# Altium PCB OFP_MCM_v1.62.PcbDoc (part 1 of 8)
Units mil, origin at the board's own origin, x right, y up, seen from the top; angles counter-clockwise.
Board outline 4330.71 x 4724.41 mil, 4 copper layers (Top Layer, Layer 1, Layer 2, Bottom Layer), stack 62.047 mil thick; 385 components, 287 nets, 1341 pads, 554 vias.
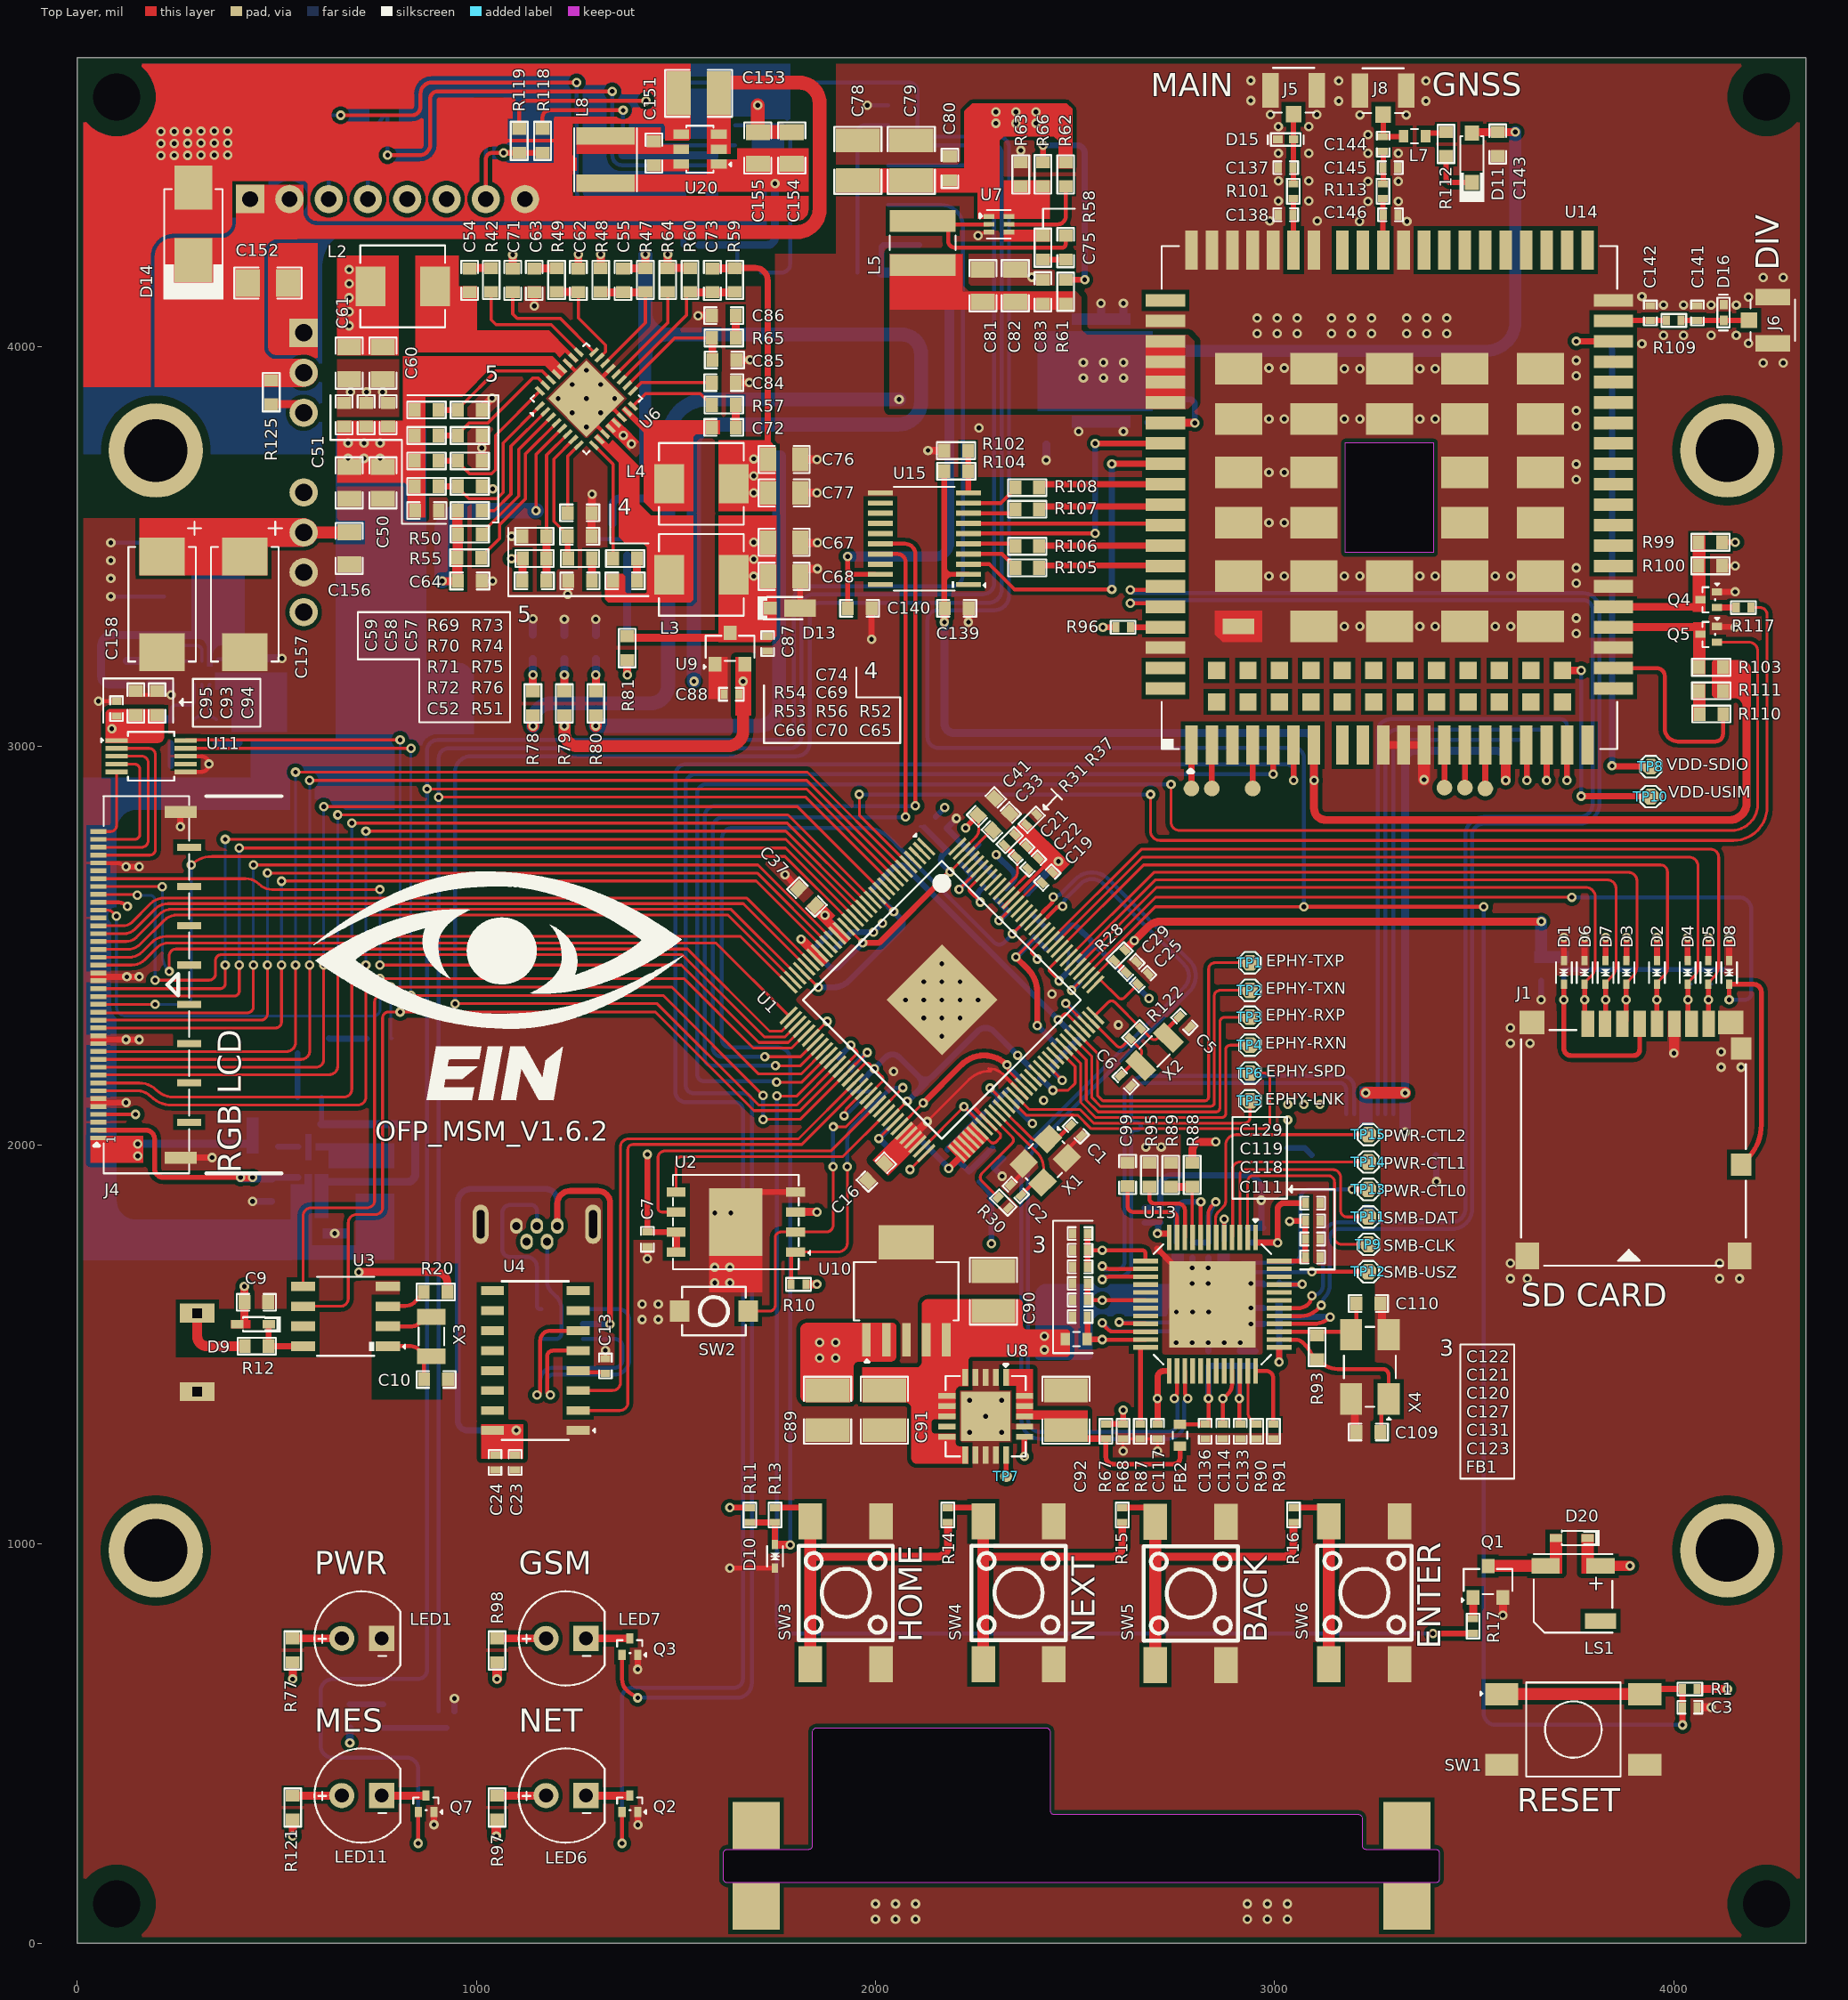
[diagram p0: Top Layer view]
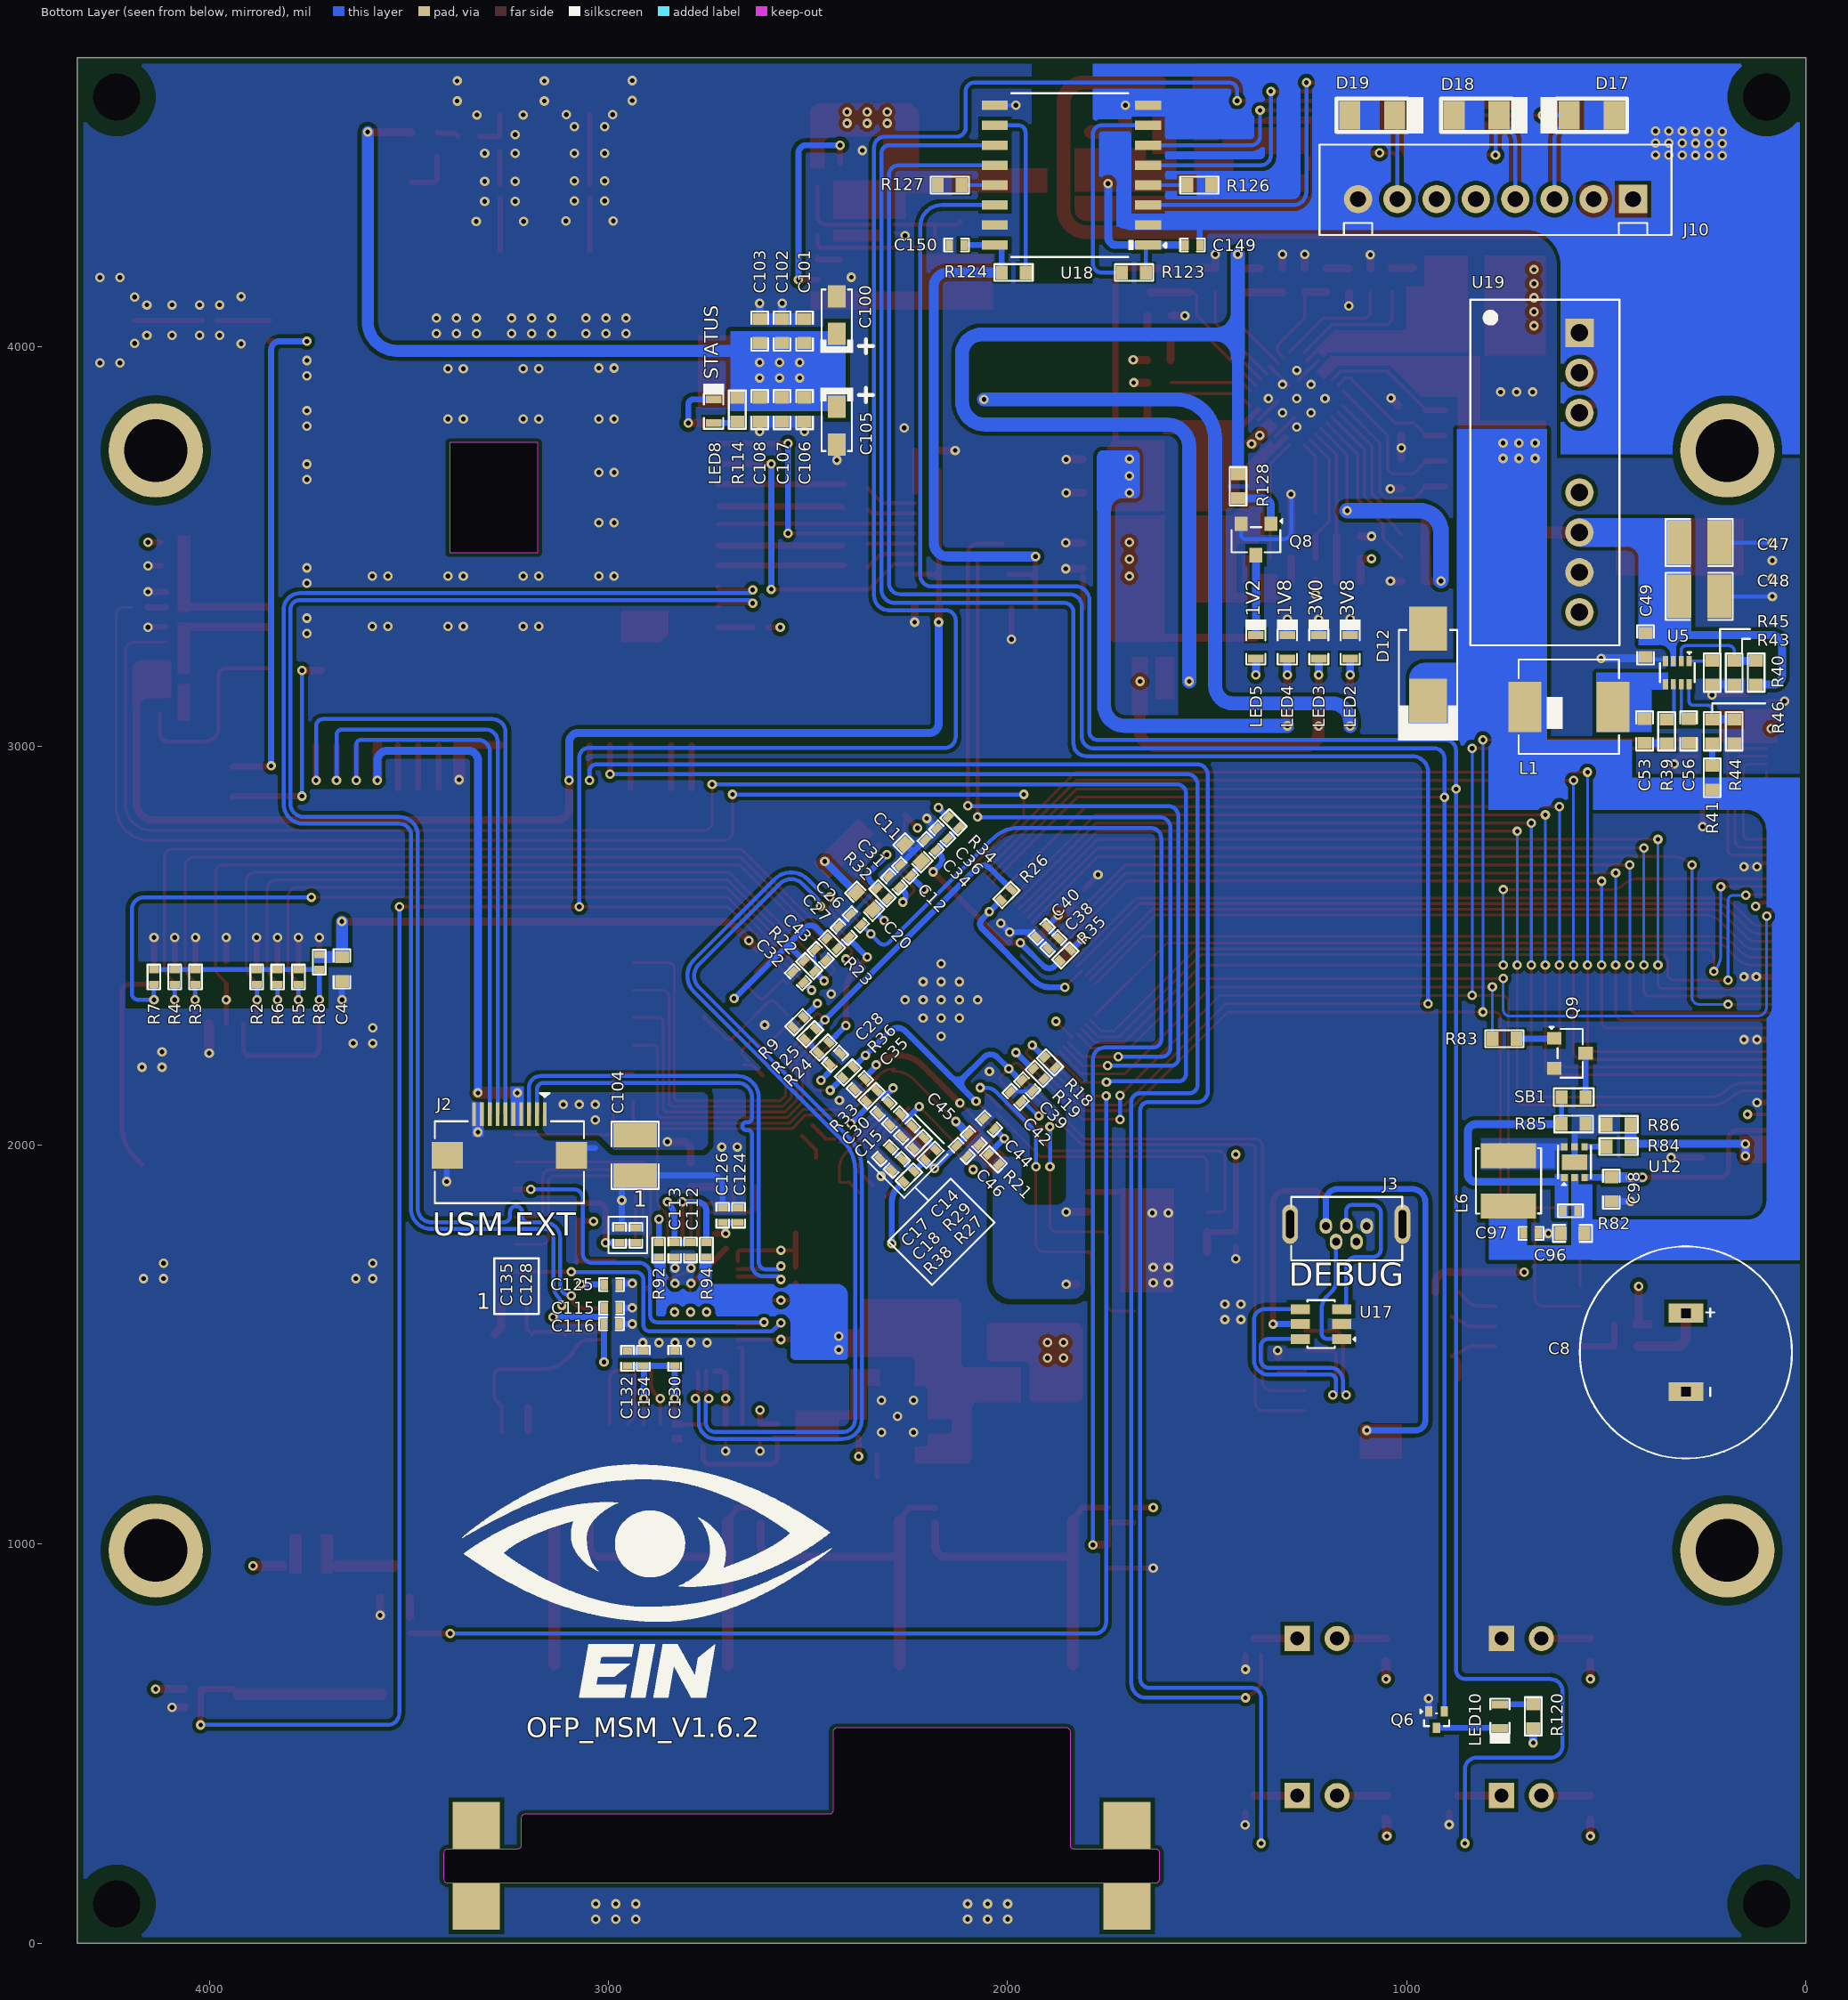
[diagram p1: Bottom Layer view, seen from below]
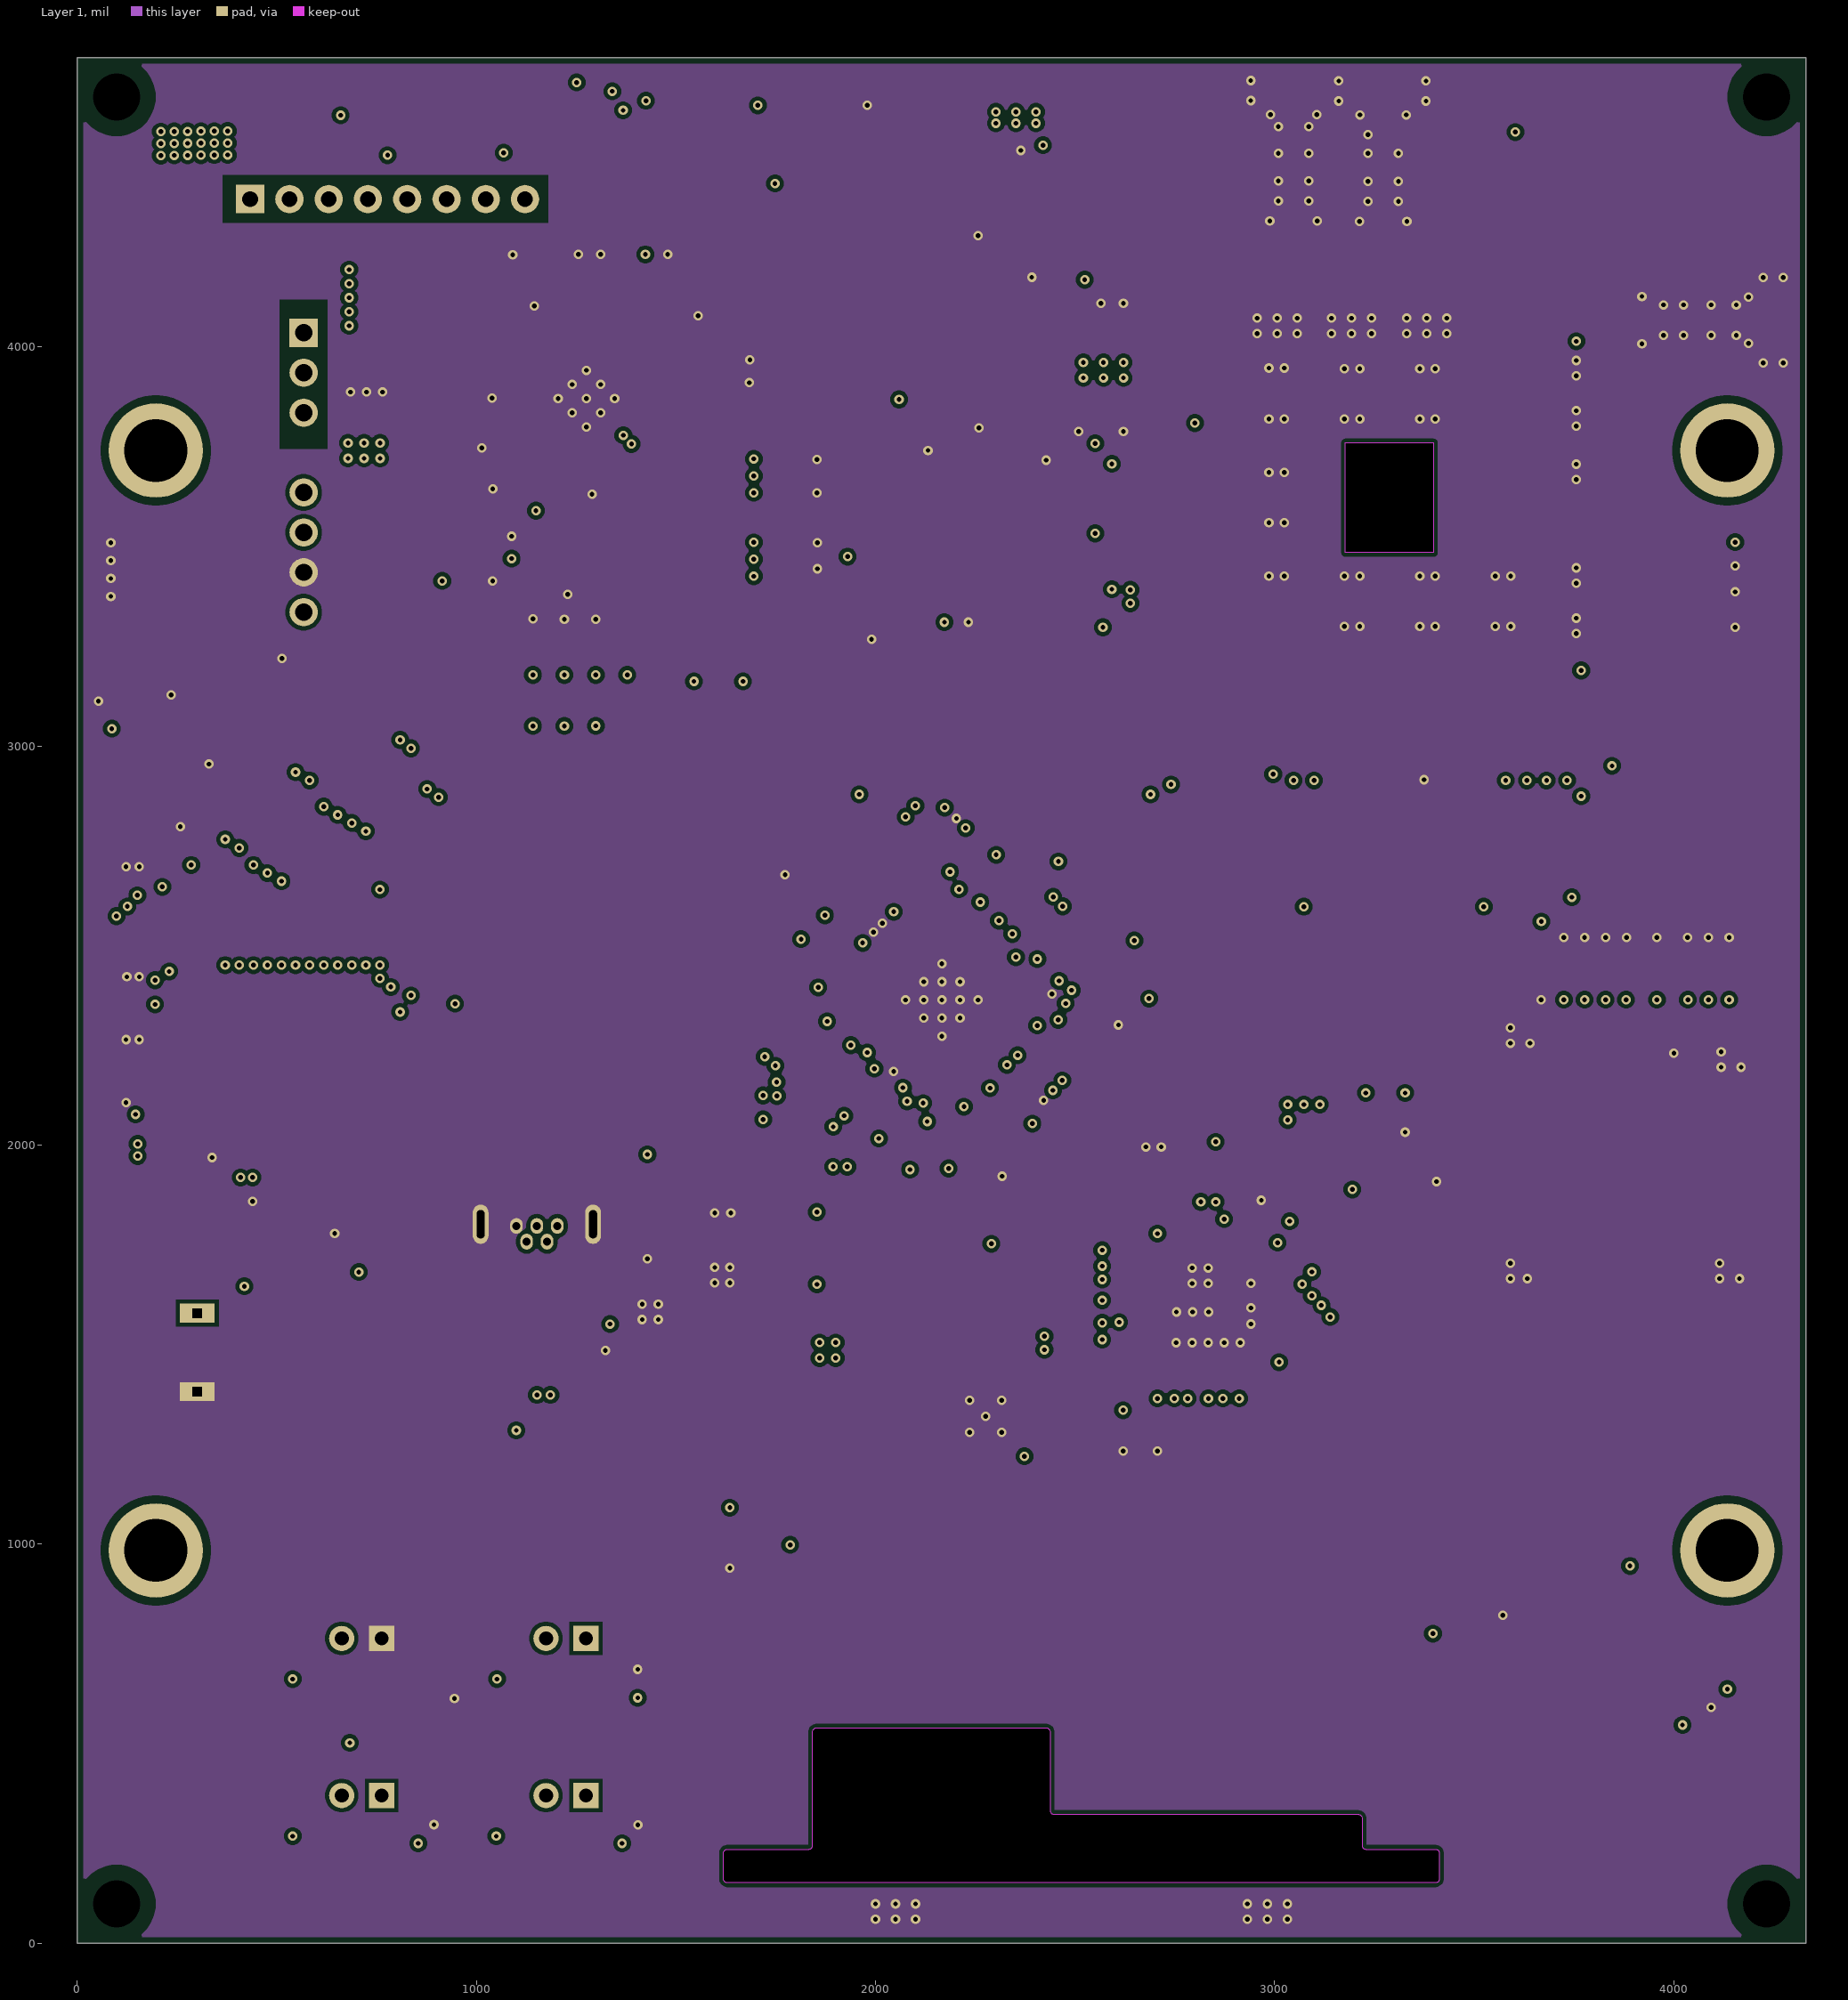
[diagram p2: Layer 1]
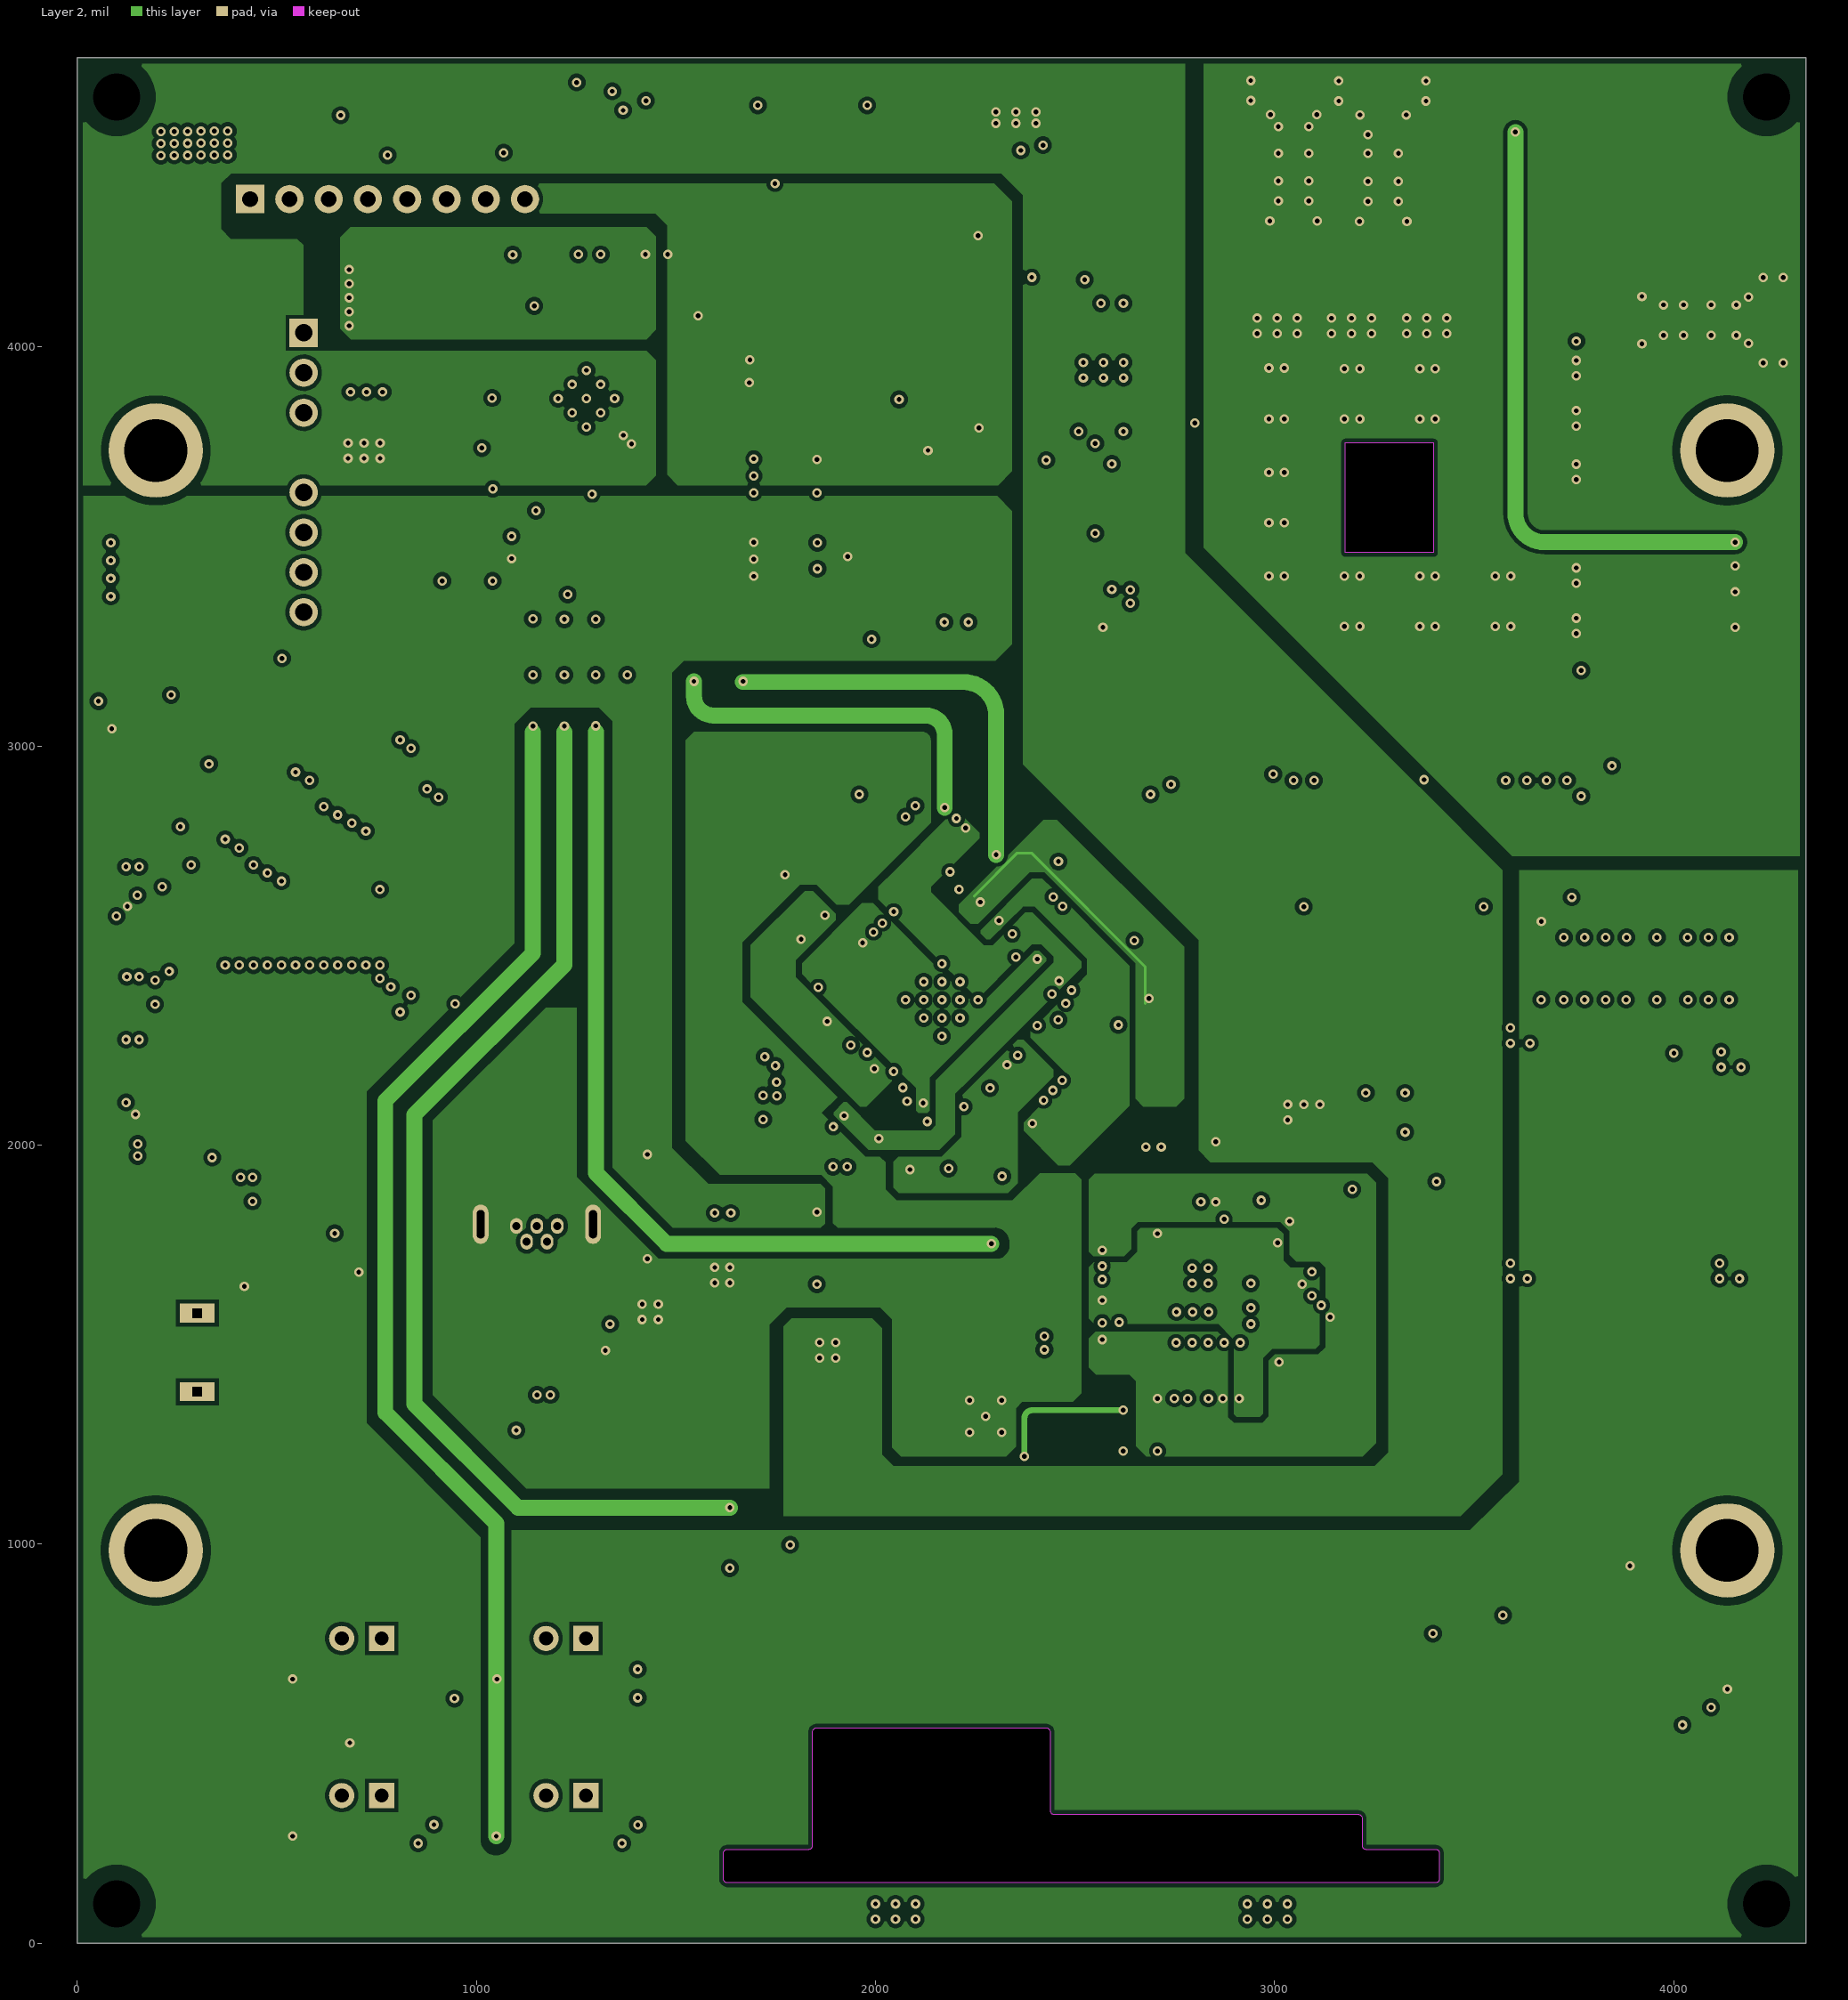
[diagram p3: Layer 2]
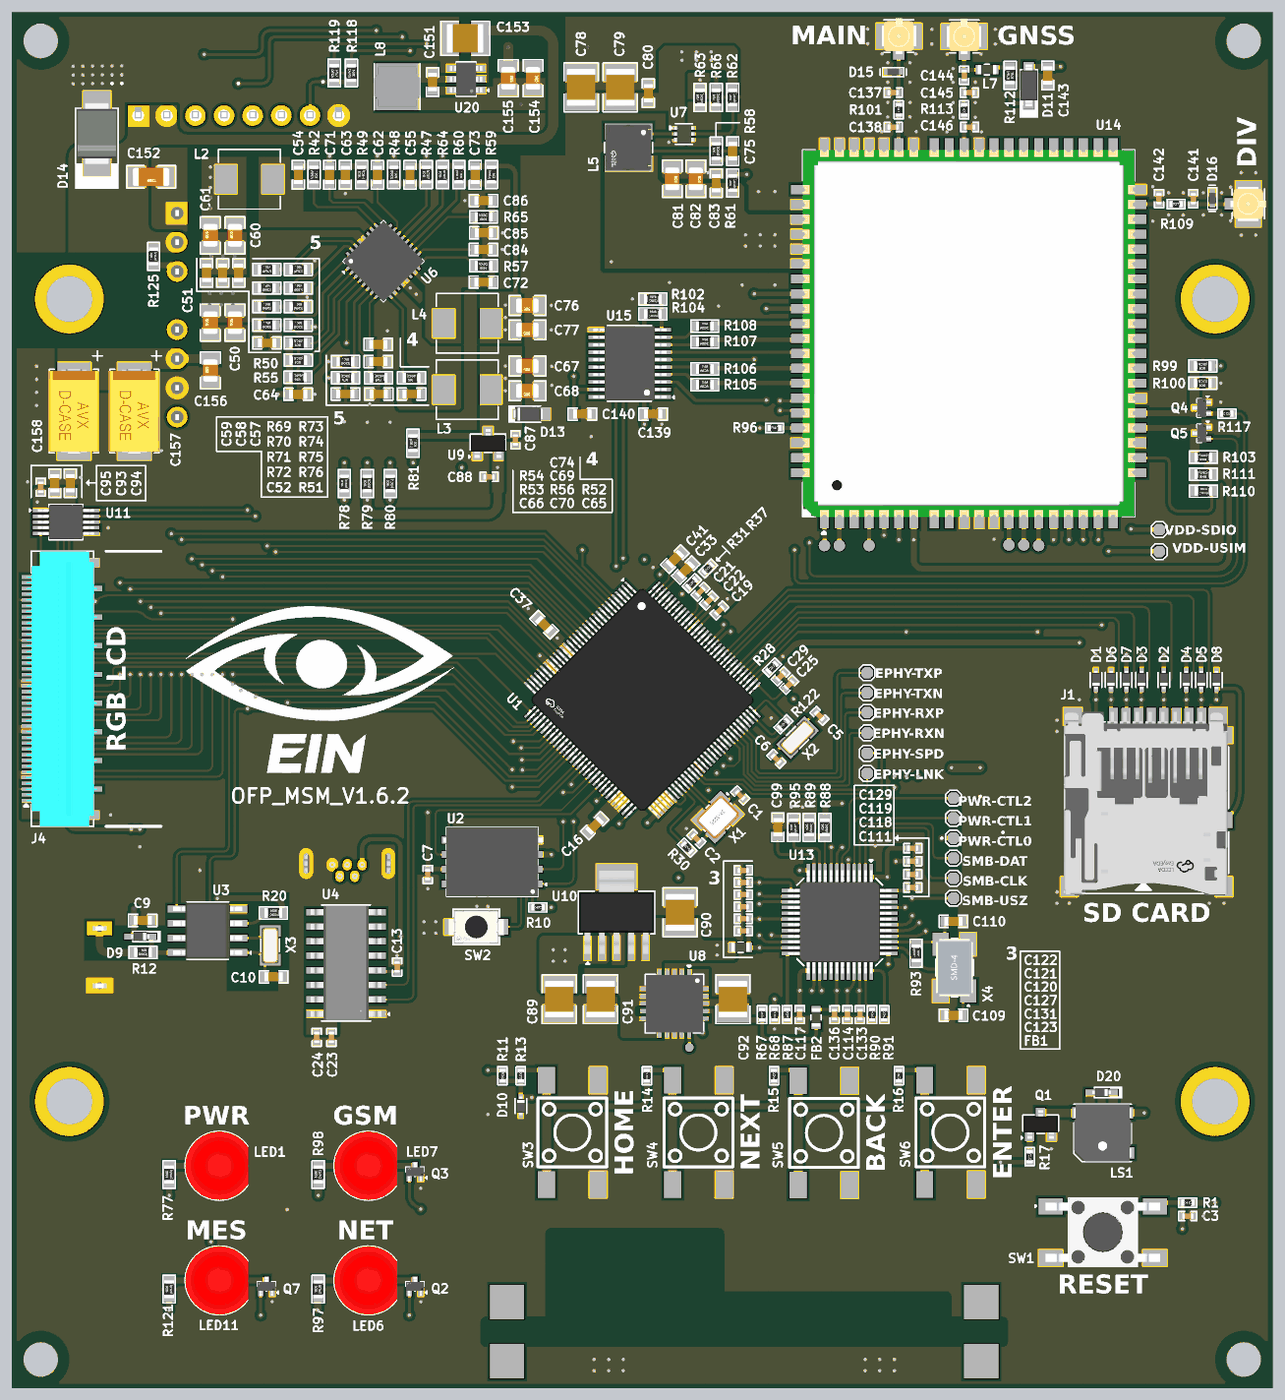
[diagram p8: 3D render of the assembled board from above, using the file's embedded part models]
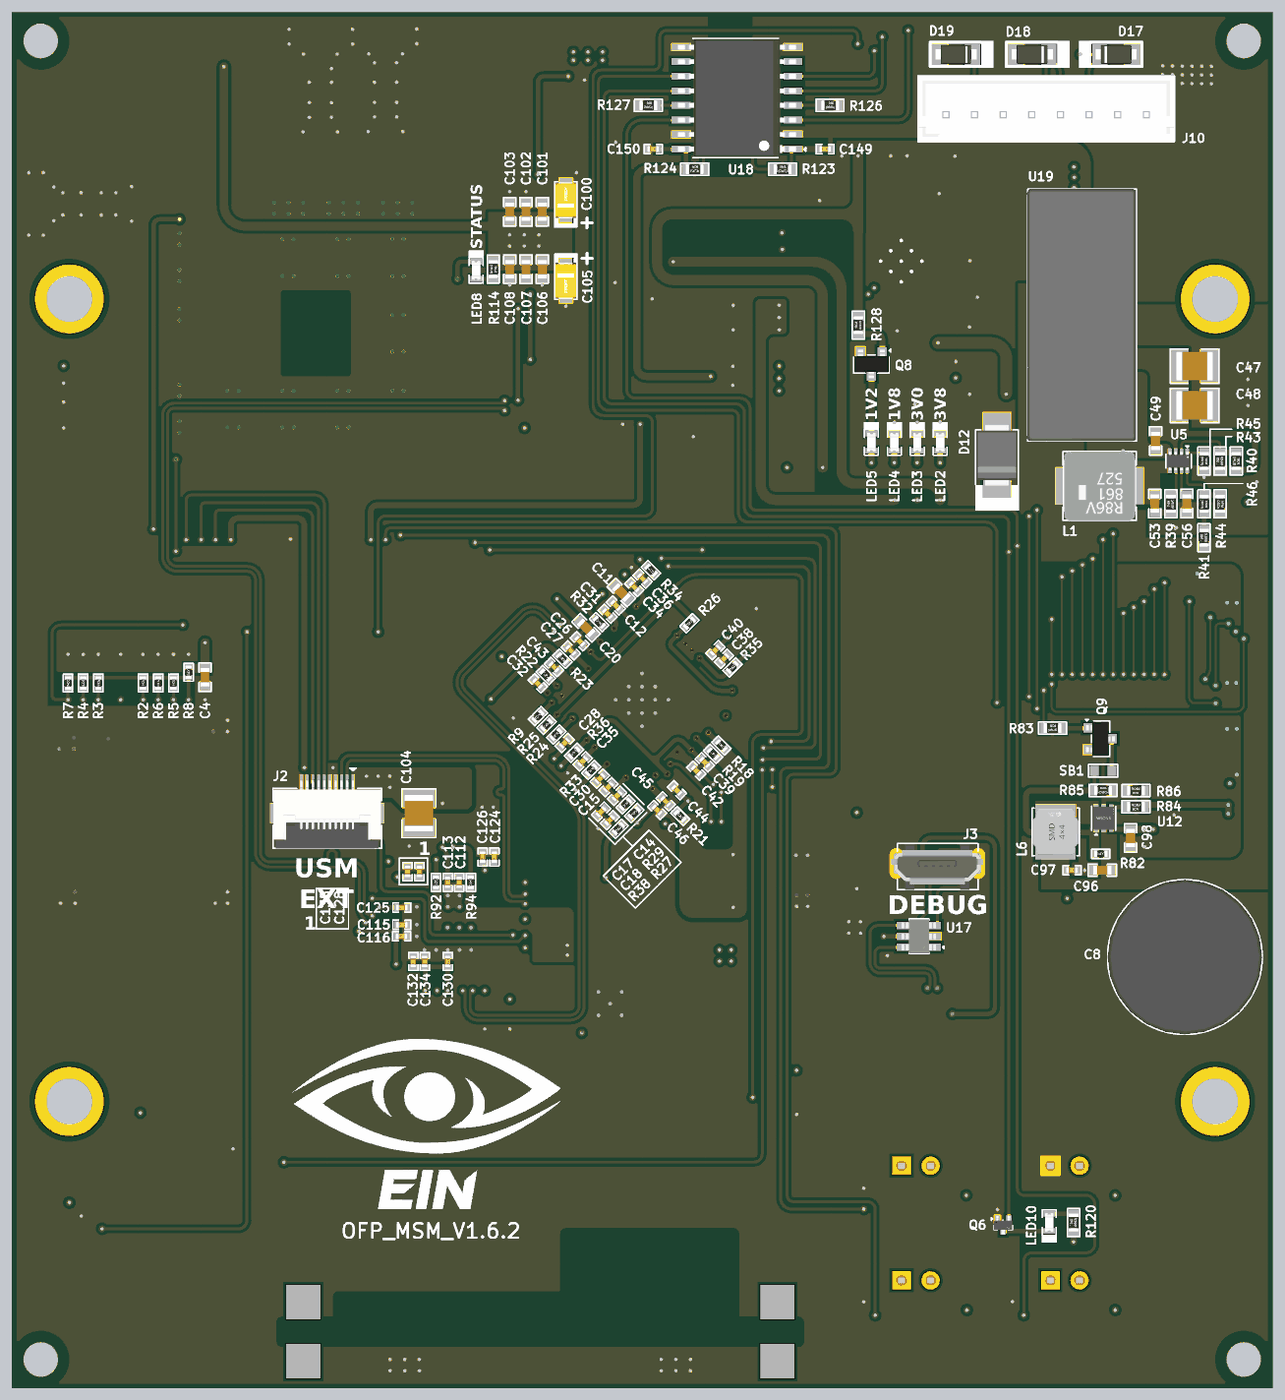
[diagram p9: 3D render of the assembled board from below, using the file's embedded part models]

## Layer stack, top to bottom
Top Solder: solder mask 0.4, Solder Resist, Dk 3.5
Top Layer: signal copper 1.378
Dielectric 2: prepreg 7.992, PP-006, Dk 4.4
Layer 1: signal copper 1.378
Dielectric 1: dielectric 40.551, FR-4, Dk 4.6
Layer 2: signal copper 1.378
Dielectric 3: prepreg 7.992, PP-006, Dk 4.4
Bottom Layer: signal copper 1.378
Bottom Solder: solder mask 0.4, Solder Resist, Dk 3.5

## Board outline
0,0 0,4724.41 4330.71,4724.41 4330.71,0
cut-out: 1629.13,151.22 cw(c1629.13,161.42) 1618.93,161.42 1618.93,225.59 cw(c1629.13,225.59) 1629.13,235.79 1833.05,235.79 ccw(c1833.05,244.9) 1842.16,244.9 1842.16,529.53 cw(c1852.36,529.53) 1852.36,539.73 2427.16,539.73 cw(c2427.16,529.53) 2437.36,529.53 2437.36,332.85 ccw(c2447.01,332.85) 2447.01,323.19 3208.66,323.19 cw(c3208.66,312.99) 3218.85,312.99 3218.85,244.82 ccw(c3227.88,244.82) 3227.88,235.79 3402.36,235.79 cw(c3402.36,225.59) 3412.56,225.59 3412.56,161.42 cw(c3402.36,161.42) 3402.36,151.22
cut-out: 3177.17,3484.25 3177.17,3759.84 3397.64,3759.84 3397.64,3484.25

## Design rules (kind name [scope] priority, off if disabled: settings)
BoardOutlineClearance [All] p1: gap=0 ignorepadtopadclearanceinfootprint=FALSE except(15: Poly-OutlineEdge)
Clearance [All] p1: gap=10 ignorepadtopadclearanceinfootprint=FALSE except(5: Track-Via; 6: Arc-Via SMDPad-SMDPad; 7: Arc-Arc Arc-Track Arc-SMDPad Arc-THPad Arc-Fill Arc-Region Track-Track Track-SMDPad Track-THPad Track-Fill Track-Region SMDPad-Via SMDPad-Fill SMDPad-Region THPad-THPad THPad-Region Via-Fill Via-Region Fill-Fill Fill-Region Region-Region; 15: Poly-Poly)
ComponentClearance [All] p1: gap=0 collisioncheckmode=3 verticalgap=0 showdistances=FALSE
DiffPairsRouting [InDifferentialPairClass('DIFF_USB')] p1: maxlimit=10 minlimit=7 mostfreqgap=10 toplayer_maxgap=7 toplayer_prefgap=7 toplayer_minwidth=10 toplayer_maxwidth=10 toplayer_prefwidth=10 midlayer1_mingap=10 midlayer1_minwidth=7 midlayer1_maxwidth=7 midlayer1_prefwidth=7 midlayer2_mingap=10 midlayer2_minwidth=7 midlayer2_maxwidth=7 midlayer2_prefwidth=7 bottomlayer_maxgap=7 bottomlayer_prefgap=7 bottomlayer_minwidth=10 bottomlayer_maxwidth=10 bottomlayer_prefwidth=10 impedanceprofiledriven=TRUE impedanceprofileid={ABD523BC-F643-4530-ABE1-0D8876D3E9E7} impedanceprofilevalue=90.000000 maxuncoupledlength=500
HoleSize [All] p1: absolutevalues=TRUE maxlimit=1000 minlimit=1 maxpercent=80.000 minpercent=20.000
HoleToHoleClearance [All] p1: gap=0 allowstackedmicrovias=TRUE
MinimumSolderMaskSliver [All] p1: minsoldermaskwidth=0
PolygonConnect [All] p1: connectstyle=Direct reliefconductorwidth=10 reliefentries=4 polygonreliefangle="90 Angle" airgapwidth=10
RoutingVias [All] p1: holewidth=11.81 width=23.62 viastyle="Through Hole" minholewidth=7.87 minwidth=15.75 maxholewidth=27.56 maxwidth=47.24
ShortCircuit "ShortCircuit - No NET" [InNet('No Net')] p1: allowed=TRUE
SilkToSilkClearance [All] p1: silktosilkclearance=0
SilkToSolderMaskClearance [IsPad] p1: minsilkscreentomaskgap=0 clearancetoexposedcopper=TRUE
SolderMaskExpansion [All] p1: expansion=4 istentingtop=FALSE
SupplyNets "Schematic Supply Nets_7" [InNet('GND-IN')] p1: voltage=0.000
SupplyNets "Schematic Supply Nets_4" [InNet('3V3-I')] p2: voltage=0.000
SupplyNets "Schematic Supply Nets_1" [InNet('12V')] p3: voltage=0.000
SupplyNets "Schematic Supply Nets_51" [InNet('VCC-DRAM')] p4: voltage=0.000
SupplyNets "Schematic Supply Nets_50" [InNet('+EXT')] p5: voltage=0.000
SupplyNets "Schematic Supply Nets_49" [InNet('VCC-RTC')] p6: voltage=0.000
SupplyNets "Schematic Supply Nets_48" [InNet('VDD11')] p7: voltage=0.000
SupplyNets "Schematic Supply Nets_47" [InNet('VCC-USB')] p8: voltage=0.000
SupplyNets "Schematic Supply Nets_40" [InNet('+1.8V')] p9: voltage=0.000
SupplyNets "Schematic Supply Nets_39" [InNet('VRA1')] p10: voltage=0.000
SupplyNets "Schematic Supply Nets_38" [InNet('VLED+')] p11: voltage=0.000
SupplyNets "Schematic Supply Nets_37" [InNet('+5VUSB')] p12: voltage=0.000
SupplyNets "Schematic Supply Nets_36" [InNet('VDD33')] p13: voltage=0.000
SupplyNets "Schematic Supply Nets_35" [InNet('VLED-')] p14: voltage=0.000
SupplyNets "Schematic Supply Nets_34" [InNet('VCC-MCSI')] p15: voltage=0.000
SupplyNets "Schematic Supply Nets_32" [InNet('V7V')] p16: voltage=0.000
SupplyNets "Schematic Supply Nets_31" [InNet('AVCC')] p17: voltage=0.000
SupplyNets "Schematic Supply Nets_30" [InNet('3.3V-HUB')] p18: voltage=0.000
SupplyNets "Schematic Supply Nets_28" [InNet('VDD-SYS')] p19: voltage=0.000
SupplyNets "Schematic Supply Nets_27" [InNet('AGND')] p20: voltage=0.000
SupplyNets "Schematic Supply Nets_26" [InNet('RTC_VIO')] p21: voltage=0.000
SupplyNets "Schematic Supply Nets_25" [InNet('VSD')] p22: voltage=0.000
SupplyNets "Schematic Supply Nets_22" [InNet('VCC_PE')] p23: voltage=0.000
SupplyNets "Schematic Supply Nets_21" [InNet('+3.0V')] p24: voltage=0.000
SupplyNets "Schematic Supply Nets_20" [InNet('VDD-PHY')] p25: voltage=0.000
SupplyNets "Schematic Supply Nets_18" [InNet('+3.8V')] p26: voltage=0.000
SupplyNets "Schematic Supply Nets_17" [InNet('+USIM')] p27: voltage=0.000
SupplyNets "Schematic Supply Nets_16" [InNet('SVREF')] p28: voltage=0.000
SupplyNets "Schematic Supply Nets_15" [InNet('CH_3.3V')] p29: voltage=0.000
SupplyNets "Schematic Supply Nets_14" [InNet('VCC-HP')] p30: voltage=0.000
SupplyNets "Schematic Supply Nets_13" [InNet('V3S_RST')] p31: voltage=0.000
SupplyNets "Schematic Supply Nets_12" [InNet('HPVCCBP')] p32: voltage=0.000
SupplyNets "Schematic Supply Nets_11" [InNet('+1.2V')] p33: voltage=0.000
SupplyNets "Schematic Supply Nets_10" [InNet('VCC-PLL')] p34: voltage=0.000
SupplyNets "Schematic Supply Nets_9" [InNet('+3.3V')] p35: voltage=0.000
SupplyNets "Schematic Supply Nets_8" [InNet('VRA2')] p36: voltage=0.000
SupplyNets "Schematic Supply Nets_6" [InNet('1.1V-HUB')] p37: voltage=0.000
SupplyNets "Schematic Supply Nets_5" [InNet('VDD-CPU')] p38: voltage=0.000
SupplyNets "Schematic Supply Nets_3" [InNet('VCC-PHY')] p39: voltage=0.000
SupplyNets "Schematic Supply Nets_2" [InNet('KEYADC0')] p40: voltage=0.000
SupplyNets "Schematic Supply Nets" [InNet('VCC-IO')] p41: voltage=0.000
SupplyNets "Schematic Supply Nets_45" [InNet('GND')] p42: voltage=0.000
SupplyNets "Schematic Supply Nets_42" [InNet('+5V')] p43: voltage=0.000
SupplyNets "Schematic Supply Nets_41" [InNet('VIN+')] p44: voltage=0.000
Width [All] p1: maxlimit=100 minlimit=7 preferedwidth=15 minimp=50.000000 maximp=50.000000 favimp=50.000000
22 further rules are at their usual default settings.

## Classes and differential pairs
differential pair class DIFF_USB: CH_USB D USB-D USB-GSM-D USB-PD-D
component class RGB-LCD-Sheet: C93 C94 C95 C96 C97 C98 J4 L6 Q9 R82 R83 R84 R85 R86 SB1 U11 U12
component class Others-Sheet: C149 C150 C151 C152 C153 C154 C155 C156 C157 C158 D14 D17 D18 D19 J10 L8 LED10 LED11 Q6 Q7 R117 R118 R119 R120 R121 R123 R124 R125 R126 R127 U18 U19 U20
component class Microprocessor-Sheet: C1 C2 C3 C4 C5 C6 C7 C8 C9 C10 C11 C12 C13 C14 C15 C16 C17 C18 C19 C20 C21 C22 C23 C24 C25 C26 C27 C28 C29 C30 C31 C32 C33 C34 C35 C36 C37 C38 C39 C40 C41 C42 C43 C44 C45 C46 D1 D2 D3 D4 D5 D6 D7 D8 D9 D10 D20 J1 J2 J3 LS1 Q1 R1 R2 R3 R4 R5 R6 R7 R8 R9 R10 R11 R12 R13 R14 R15 R16 R17 R18 R19 R20 R21 R22 R23 R24 R25 R26 R27 R28 R29 R30 R31 R32 R33 R34 R35 R36 R37 R38 R122 SW1 SW2 SW3 SW4 SW5 SW6 TP1 TP2 TP3 TP4 TP5 TP6 U1 U2 U3 U4 U17 X1 X2 X3
component class GSM-USB-HUB-Sheet: C99 C100 C101 C102 C103 C104 C105 C106 C107 C108 C109 C110 C111 C112 C113 C114 C115 C116 C117 C118 C119 C120 C121 C122 C123 C124 C125 C126 C127 C128 C129 C130 C131 C132 C133 C134 C135 C136 C137 C138 C139 C140 C141 C142 C143 C144 C145 C146 D11 D15 D16 FB1 FB2 J5 J6 J8 L7 LED6 LED7 LED8 Q2 Q3 Q4 Q5 R87 R88 R89 R90 R91 R92 R93 R94 R95 R96 R97 R98 R99 R100 R101 R102 R103 R104 R105 R106 R107 R108 R109 R110 R111 R112 R113 R114 TP8 TP9 TP10 TP11 TP12 TP13 TP14 TP15 U13 U14 U15 X4
component class Power-Sheet: C47 C48 C49 C50 C51 C52 C53 C54 C55 C56 C57 C58 C59 C60 C61 C62 C63 C64 C65 C66 C67 C68 C69 C70 C71 C72 C73 C74 C75 C76 C77 C78 C79 C80 C81 C82 C83 C84 C85 C86 C87 C88 C89 C90 C91 C92 D12 D13 L1 L2 L3 L4 L5 LED1 LED2 LED3 LED4 LED5 Q8 R39 R40 R41 R42 R43 R44 R45 R46 R47 R48 R49 R50 R51 R52 R53 R54 R55 R56 R57 R58 R59 R60 R61 R62 R63 R64 R65 R66 R67 R68 R69 R70 R71 R72 R73 R74 R75 R76 R77 R78 R79 R80 R81 R128 TP7 U5 U6 U7 U8 U9 U10
differential pair D: +D_P -D_N
differential pair CH_U: +CH_U_P -CH_U_N
differential pair USB-PD-D: +USB-PD-D_P -USB-PD-D_N
differential pair USB-GSM-D: +USB-GSM-D_P -USB-GSM-D_N
differential pair USB-D: +USB-D_P -USB-D_N

## Components (designator, comment, footprint, x,y, rotation, side; value= is the part's Value field where it differs from the comment)
C1 "15pF" Cap-0402 2501.97,2036.22 r135 top
C2 "15pF" Cap-0402 2351.12,1886.86 r315 top
C3 "1uF" Cap-0402 4040,591.15 r180 top
C4 "10uF" Cap-0603 3667.58,2441.21 r90 bottom
C5 "15pF" Cap-0402 2774.04,2308.58 r135 top
C6 "15pF" Cap-0402 2626.31,2160.98 r135 top
C7 "0.1uF" Cap-0402 1428.32,1763.59 r90 top value=100nF
C8 "0.47F" "SC EB 5R5 474 M" 300.78,1480.32 r270 bottom
C9 "0.1uF" Cap-0603 448.77,1606.08 r180 top value=100nF
C10 "12pF" Cap-0603 899.04,1412.46 r180 top
C11 "10uF" Cap-0603 2236.89,2731.98 r225 bottom
C12 "0.1uF" Cap-0402 2256.34,2687.54 r225 bottom value=100nF
C13 "0.1uF" Cap-0402 1323.14,1446.32 r270 top value=100nF
C14 "0.1uF" Cap-0402 2251.96,2034.43 r135 bottom value=100nF
C15 "0.1uF" Cap-0402 2281.52,2063.99 r135 bottom value=100nF
C16 "10uF" Cap-0603 2001.91,1932 r45 top
C17 "1uF" Cap-0402 2306.68,1979.57 r135 bottom
C18 "0.1uF" Cap-0402 2276.96,1950.28 r135 bottom value=100nF
C19 "0.1uF" Cap-0402 2430.25,2670.36 r225 top value=100nF
C20 "10uF" Cap-0603 2357.9,2610.96 r225 bottom
C21 "4.7uF" Cap-0402 2365.45,2735.01 r225 top
C22 "1uF" Cap-0402 2394.85,2705.19 r225 top
C23 "1uF" Cap-0402 1097.21,1204.45 r90 top
C24 "0.1uF" Cap-0402 1046.81,1204.45 r90 top value=100nF
C25 "4.7uF" Cap-0402 2670.23,2415.94 r225 top
C26 "1nF" Cap-0402 2380.01,2564.86 r225 bottom
C27 "0.1uF" Cap-0402 2410.38,2533.49 r225 bottom value=100nF
C28 "0.1uF" Cap-0402 2432.25,2215.73 r315 bottom value=100nF
C29 "0.1uF" Cap-0402 2641.17,2445.26 r225 top value=100nF
C30 "0.1uF" Cap-0402 2310.83,2093.3 r135 bottom value=100nF
C31 "0.1uF" Cap-0402 2284.4,2659.48 r225 bottom value=100nF
C32 "10nF" Cap-0402 2524.62,2420.26 r225 bottom
C33 "10uF" Cap-0603 2315.15,2809.71 r225 top
C34 "1uF" Cap-0402 2192.45,2751.43 r225 bottom
C35 "0.1uF" Cap-0402 2369.95,2152.42 r135 bottom value=100nF
C36 "0.1uF" Cap-0402 2163.89,2779.99 r225 bottom value=100nF
C37 "10uF" Cap-0603 1828.23,2621.4 r315 top
C38 "1uF" Cap-0402 1884.89,2504.75 r135 bottom
C39 "0.1uF" Cap-0402 1950.44,2148.73 r45 bottom value=100nF
C40 "0.1uF" Cap-0402 1914.45,2534.31 r135 bottom value=100nF
C41 "10uF" Cap-0603 2277.68,2847.22 r225 top
C42 "1uF" Cap-0402 1979.94,2120.24 r225 bottom
C43 "0.1uF" Cap-0402 2468.5,2476.38 r45 bottom value=100nF
C44 "0.1uF" Cap-0402 2046.27,2053.21 r225 bottom value=100nF
C45 "1uF" Cap-0402 2084.69,2014.77 r45 bottom
C46 "0.1uF" Cap-0402 2114.25,1985.21 r45 bottom value=100nF
C47 "10uF" Cap-1210 267.13,3509.29 r0 bottom
C48 "10uF" Cap-1210 267.13,3374.49 r0 bottom
C49 "0.1uF" Cap-0603 401.5,3253.03 r90 bottom value=100nF
C50 "22uF" Cap-0805 765.78,3658.86 r90 top
C51 "22uF" Cap-0805 681.42,3658.86 r90 top
C52 "0.1uF" Cap-0603 876.01,3589.55 r180 top value=100nF
C53 "0.1uF" Cap-0603 404.1,3037.51 r90 bottom value=100nF
C54 "47nF" Cap-0603 983.33,4166.36 r270 top
C55 "82pF" Cap-0603 1367.42,4166.36 r270 top
C56 "33nF" Cap-0603 293.86,3037.51 r90 bottom
C57 "10uF" Cap-0603 778.78,3829.58 r270 top
C58 "10uF" Cap-0603 723.66,3829.58 r270 top
C59 "0.1uF" Cap-0603 668.42,3829.58 r270 top value=100nF
C60 "22uF" Cap-0805 765.88,3958.95 r90 top
C61 "22uF" Cap-0805 681.31,3958.95 r90 top
C62 "22pF" Cap-0603 1255.54,4166.36 r90 top
C63 "3.3nF" Cap-0603 1145,4166.36 r270 top
C64 "1uF" Cap-0603 983.38,3413.06 r180 top
C65 "47nF" Cap-0603 1372.64,3413.58 r180 top
C66 "22pF" Cap-0603 1145.34,3413.58 r0 top
C67 "22uF" Cap-0805 1771,3509.99 r180 top
C68 "22uF" Cap-0805 1771,3425 r180 top
C69 "22pF" Cap-0603 1258.85,3525.23 r0 top
C70 "2.2nF" Cap-0603 1259.53,3413.58 r180 top
C71 "0.01uF" Cap-0603 1091.11,4166.36 r270 top
C72 "47nF" Cap-0603 1619.92,3798.15 r180 top
C73 "22pF" Cap-0603 1591.17,4166.36 r270 top
C74 "0.01uF" Cap-0603 1258.85,3584 r180 top
C75 "0.1uF" Cap-0603 2476.26,4248.09 r90 top value=100nF
C76 "22uF" Cap-0805 1771,3717.74 r180 top
C77 "22uF" Cap-0805 1771,3634 r180 top
C78 "10uF" Cap-1210 1955.7,4466.94 r270 top
C79 "10uF" Cap-1210 2089.75,4466.94 r270 top
C80 "0.1uF" Cap-0603 2186.17,4446.94 r270 top value=100nF
C81 "22uF" Cap-0805 2268.86,4153.04 r270 top
C82 "22uF" Cap-0805 2349.72,4153.04 r270 top
C83 "0.1uF" Cap-0603 2419.53,4138.04 r270 top value=100nF
C84 "0.01uF" Cap-0603 1619.92,3910.02 r180 top
C85 "22pF" Cap-0603 1621.13,3967.16 r0 top
C86 "2.2nF" Cap-0603 1619.92,4077.83 r180 top
C87 "1uF" Cap-0402 1729.6,3256.34 r90 top
C88 "1uF" Cap-0402 1639.05,3129.29 r0 top
C89 "10uF" Cap-1210 1880,1335.58 r90 top
C90 "10uF" Cap-1210 2295.43,1634 r270 top
C91 "10uF" Cap-1210 2022,1335.58 r90 top
C92 "10uF" Cap-1210 2477,1335.58 r270 top
C93 "10uF" Cap-0603 146.87,3107.5 r270 top
C94 "10uF" Cap-0603 200,3107.5 r270 top
C95 "0.1uF" Cap-0402 98.46,3093.5 r270 top value=100nF
C96 "2.2uF" Cap-0603 584.74,1778.56 r180 bottom
C97 "0.1uF" Cap-0402 688.51,1778.59 r0 bottom value=100nF
C98 "1uF" Cap-0603 487.5,1889.18 r90 bottom
C99 "1uF" Cap-0603 2631.5,1926.22 r270 top
C100 "100uF" Case-A 2427.72,4079.37 r90 bottom
C101 "0.1uF" Cap-0603 2508.62,4039.37 r270 bottom value=100nF
C102 "33pF" Cap-0603 2564.8,4039.37 r270 bottom
C103 "10pF" Cap-0603 2620.98,4039.37 r270 bottom
C104 "10uF" Cap-1210 2933,1974.1 r90 bottom
C105 "100uF" Case-A 2427.72,3802.52 r270 bottom
C106 "0.1uF" Cap-0603 2508.62,3842.52 r90 bottom value=100nF
C107 "33pF" Cap-0603 2564.8,3842.52 r90 bottom
C108 "10pF" Cap-0603 2620.98,3842.52 r90 bottom
C109 "30pF" Cap-0603 3234.92,1280.79 r0 top
C110 "30pF" Cap-0603 3234.92,1602.8 r180 top
C111 "0.1uF" Cap-0402 3095.01,1719.32 r180 top value=100nF
C112 "10nF" Cap-0402 2794.31,1736.88 r90 bottom
C113 "1nF" Cap-0402 2834.2,1736.88 r90 bottom
C114 "0.1uF" Cap-0402 2870.22,1282.58 r90 top value=100nF
C115 "10nF" Cap-0402 2991.61,1591.21 r0 bottom
C116 "1nF" Cap-0402 2992.39,1551.84 r0 bottom
C117 "0.1uF" Cap-0402 2706.52,1282.58 r90 top value=100nF
C118 "10nF" Cap-0402 3095.01,1764.59 r180 top
C119 "1nF" Cap-0402 3095.02,1809.74 r180 top
C120 "0.1uF" Cap-0402 2512.57,1694.88 r0 top value=100nF
C121 "10nF" Cap-0402 2512.57,1736.46 r0 top
C122 "1nF" Cap-0402 2512.56,1778.03 r0 top
C123 "1uF" Cap-0402 2512.55,1570.15 r0 top
C124 "0.1uF" Cap-0402 2673.72,1823.95 r270 bottom value=100nF
C125 "10nF" Cap-0402 2991.61,1650.26 r0 bottom
C126 "1nF" Cap-0402 2713.61,1823.94 r270 bottom
C127 "0.1uF" Cap-0402 2512.57,1653.3 r0 top value=100nF
C128 "10nF" Cap-0402 2931.16,1773.87 r270 bottom
C129 "1nF" Cap-0402 3095.01,1854.35 r180 top
C130 "0.1uF" Cap-0402 2833.94,1465.22 r270 bottom value=100nF
C131 "10nF" Cap-0402 2512.56,1611.73 r0 top
C132 "1nF" Cap-0402 2952.05,1465.22 r270 bottom
C133 "0.1uF" Cap-0402 2913.59,1282.58 r90 top value=100nF
C134 "10nF" Cap-0402 2912.68,1465.22 r270 bottom
C135 "1nF" Cap-0402 2972.05,1773.88 r270 bottom
C136 "10uF" Cap-0402 2825.94,1282.58 r90 top
C137 "DNP" Cap-0402 3027.56,4448.82 r0 top
C138 "DNP" Cap-0402 3027.56,4330.71 r0 top
C139 "0.1uF" Cap-0603 2203.11,3345 r180 top value=100nF
C140 "0.1uF" Cap-0603 1960,3345 r180 top value=100nF
C141 "DNP" Cap-0402 4058.9,4084.62 r270 top
C142 "DNP" Cap-0402 3941.1,4084.62 r270 top
C143 "DNP" Cap-0603 3559,4508 r90 top value=100nF
C144 "DNP" Cap-0402 3271.65,4507.88 r90 top
C145 "DNP" Cap-0402 3289.34,4448.82 r180 top
C146 "DNP" Cap-0402 3290.34,4330.55 r180 top
C149 "0.1uF" Cap-0402 1536.91,4254.94 r0 bottom value=100nF
C150 "0.1uF" Cap-0402 2127.74,4254.94 r0 bottom value=100nF
C151 "0.1uF" Cap-0603 1444.74,4485 r90 top value=100nF
C152 "47uF" Cap-1206 477.81,4159.56 r180 top
C153 "10uF" Cap-1210 1556.91,4635 r0 top
C154 "22uF" Cap-0805 1790,4498 r270 top
C155 "22uF" Cap-0805 1705,4498 r270 top
C156 "22uF" Cap-0805 681.42,3494.86 r90 top
C157 "47uF" Case-D 420,3354.78 r270 top
C158 "47uF" Case-D 212.74,3354.78 r270 top
D1 "ESD5Z3.3C" "SOD-523 (Bi-Directional)" 3724.32,2432.06 r270 top
D2 "ESD5Z3.3C" "SOD-523 (Bi-Directional)" 3957.58,2432.06 r270 top
D3 "ESD5Z3.3C" "SOD-523 (Bi-Directional)" 3881.18,2432.06 r270 top
D4 "ESD5Z3.3C" "SOD-523 (Bi-Directional)" 4034.48,2432.06 r270 top
D5 "ESD5Z3.3C" "SOD-523 (Bi-Directional)" 4086.45,2432.06 r270 top
D6 "ESD5Z3.3C" "SOD-523 (Bi-Directional)" 3776.27,2432.06 r270 top
D7 "ESD5Z3.3C" "SOD-523 (Bi-Directional)" 3828.72,2432.06 r270 top
D8 "ESD5Z3.3C" "SOD-523 (Bi-Directional)" 4138.46,2432.06 r270 top
D9 "1N4148WT" SOD-523F 440.27,1550.94 r0 top
D10 "ESD5Z3.3C" "SOD-523 (Bi-Directional)" 1748.03,969.27 r90 top
D11 "DNP" SOD-123 3493.68,4473.67 r270 top
D12 "SMBJ5.0A" SMB_ 946.37,3203.61 r270 bottom
D13 "MSP3V3HM3/89A" MicroSMP 1773.4,3345 r180 top
D14 "SMBJ12A" SMB_ 291.14,4308.07 r270 top
D15 "TPD1E0B04DPYR" "2-X1SON (1x.60)" 3027.56,4519.83 r180 top
D16 "TPD1E0B04DPYR" "2-X1SON (1x.60)" 4124.83,4085.62 r90 top
D17 "SMF3.3" SOD-123FL 536.93,4580 r180 bottom
D18 "SMF3.3" SOD-123FL 825.11,4580 r0 bottom
D19 "SMF3.3" SOD-123FL 1086.77,4580 r0 bottom
D20 "1N4148WT" SOD-523F 3744.11,1015.35 r0 top
FB1 "BLM18PG221SN1D" "IND-0603 (1608 Metric)" 2502.69,1513.78 r0 top value=100mR
FB2 "BLM18PG221SN1D" "IND-0603 (1608 Metric)" 2762.67,1272.71 r90 top value=100mR
J1 "5027740891" 5027740891 3900.59,2014.57 r0 top
J2 "HX0.5-10P XJH2.0 043" "HX0.5-10P XJH2.0 043" 3248,2025.89 r180 bottom
J3 "U-D-M5DD-Y-3" U-D-M5DD-Y-3 1151.51,1779.7 r180 bottom
J4 "FH41-40S-0.5SH(05)" FH41-40S-0.5SH(05) 166.63,2401.57 r90 top locked
J5 "U.FL-R-SMT(10)" U.FL-R-SMT(10) 3047.24,4612.7 r90 top
J6 "U.FL-R-SMT(10)" U.FL-R-SMT(10) 4217.7,4066.62 r0 top
J8 "DNP" U.FL-R-SMT(10) 3271.65,4611.71 r90 top
J10 "B8B-XH-A(LF)(SN)" B8B-XH-A(LF)(SN) 777.56,4370.08 r0 bottom
L1 "6.8uH" ETQP3M6R8KVN 593.96,3098.06 r0 bottom value=45.6mR
L2 "4.7uH" YSPI0518S-4R7M 815.37,4151.27 r180 top
L3 "4.7uH" YSPI0518S-4R7M 1563.74,3428.66 r0 top
L4 "4.7uH" YSPI0518S-4R7M 1563.74,3656.54 r0 top
L5 "4.7uH" SRN4018-4R7M 2118.07,4260.09 r270 top
L6 "22uH" YNR4018-220M 745.11,1910 r90 bottom
L7 "DNP" "IND-0603 (1608 Metric)" 3350.39,4527.56 r180 top value=47nH
L8 "3.9uH" FNR4030S3R9MT 1323.44,4468.73 r270 top
LED1 "RED" "TH LED 5mm_" 712.6,763.78 r180 top
LED2 "RED" LED-0603 1141.73,3248.03 r90 bottom
LED3 "RED" LED-0603 1220.47,3248.03 r90 bottom
LED4 "RED" LED-0603 1299.21,3248.03 r90 bottom
LED5 "RED" LED-0603 1377.95,3248.03 r90 bottom
LED6 "GREEN" "TH LED 5mm Green" 1224.41,370.08 r180 top
LED7 "YELLOW" "TH LED 5mm Yellow" 1224.41,763.78 r180 top
LED8 "RED" LED-0603 2736.49,3838.52 r90 bottom
LED10 "Yellow" LED-0603 766.65,568.99 r270 bottom
LED11 "GREEN" "TH LED 5mm Green" 712.6,370.08 r180 top
LS1 "FUET-5025" FUET-5025 3747.34,876.58 r180 top
Q1 "MMBT2222A-7-F" SOT-23 3534.33,905.75 r0 top
Q2 "DTC143ZETL" SOT-416 1384.5,349.41 r0 top
Q3 "DTC143ZETL" SOT-416 1384.5,743.11 r0 top
Q4 "DTC143ZETL" SOT-416 4087.56,3366.24 r90 top
Q5 "DTC143ZETL" SOT-416 4087.56,3279.63 r90 top
Q6 "DTC143ZETL" SOT-416 925.34,560 r0 bottom
Q7 "DTC143ZETL" SOT-416 874.01,349.41 r0 top
Q8 "MMBT3904" SOT-23 1377.95,3517.06 r0 bottom
Q9 "AO3400A" sot-23 591.11,2230 r270 bottom
R1 "47K" Res-0402 4040,637.02 r0 top
R2 "47K" Res-0402 3881.18,2421.21 r90 bottom
R3 "47K" Res-0402 4034.52,2421.21 r90 bottom
R4 "47K" Res-0402 4086.5,2421.21 r90 bottom
R5 "47K" Res-0402 3776.27,2421.21 r90 bottom
R6 "47K" Res-0402 3828.72,2421.21 r90 bottom
R7 "47K" Res-0402 4138.5,2421.21 r90 bottom
R8 "3.3R" Res-0402 3724.32,2458.21 r90 bottom
R9 "5.6K" Res-0402 2523.93,2307.4 r315 bottom value=5.6kR
R10 "10K" Res-0402 1806.92,1651 r0 top
R11 "100K" Res-0402 1685.04,1072.95 r90 top
R12 "120R" Res-0603 449.77,1496.12 r180 top
R13 "6.8K" Res-0402 1748.03,1072.95 r90 top value=6.8kR
R14 "8.2K" Res-0402 2181.1,1072.95 r90 top value=8.2kR
R15 "10K" Res-0402 2618.11,1072.95 r90 top
R16 "11K" Res-0402 3047.24,1072.95 r270 top value=11kR
R17 "1K" Res-0402 3496.93,794.98 r90 top
R18 "4.7K" Res-0402 1893.45,2206.73 r45 bottom
R19 "4.7K" Res-0402 1921.94,2178.23 r45 bottom
R20 "5.1K" Res-0603 898.04,1631.46 r180 top
R21 "0R" Res-0402 2034.92,1964.1 r45 bottom
R22 "0R" Res-0402 2496.57,2448.49 r45 bottom
R23 "0R" Res-0402 2439.94,2504.93 r225 bottom
R24 "0R" Res-0402 2460.81,2244.29 r315 bottom
R25 "0R" Res-0402 2494.37,2277.84 r135 bottom
R26 "0R" Res-0402 2003,2626.8 r315 bottom
R27 "2K" Res-0402 2192.84,1975.32 r315 bottom value=2kR
R28 "0R" Res-0402 2611.43,2475.18 r225 top
R29 "2K" Res-0402 2222.4,2004.88 r135 bottom value=2kR
R30 "240R" Res-0402 2320.16,1855.71 r135 top
R31 "200K" Res-0402 2335.93,2764.25 r225 top value=200kR
R32 "0R" Res-0402 2313.46,2630.42 r225 bottom
R33 "0R" Res-0402 2340.39,2122.86 r135 bottom
R34 "0R" Res-0402 2135.33,2808.55 r225 bottom
R35 "0R" Res-0402 1855.33,2475.18 r135 bottom
R36 "0R" Res-0402 2399.51,2181.98 r315 bottom
R37 "0R" Res-0402 2390.98,2815 r45 top
R38 "0R" Res-0402 2247.25,1921 r135 bottom
R39 "0R" Res-0603 348.98,3036.51 r270 bottom
R40 "536K" Res-0603 124.51,3183.36 r90 bottom value=536kR
R41 "49.9R" Res-0603 234.74,2920 r270 bottom
R42 "0R" Res-0603 1037.22,4167.36 r90 top
R43 "107K" Res-0603 179.63,3183.36 r270 bottom value=107kR
R44 "10.2K" Res-0603 179.63,3036.51 r90 bottom
R45 "DNP" Res-0603 234.74,3183.36 r90 bottom
R46 "53.6K" Res-0603 234.74,3036.51 r90 bottom value=53.6kR
R47 "10K" Res-0603 1423.35,4167.36 r270 top
R48 "10K" Res-0603 1311.48,4167.36 r90 top
R49 "20K" Res-0603 1200.94,4167.36 r270 top
R50 "100K" Res-0603 983.38,3530.5 r0 top value=100kR
R51 "100K" Res-0603 983.38,3589.55 r0 top value=100kR
R52 "0R" Res-0603 1372.64,3469.44 r0 top
R53 "45.3k" Res-0603 1145.73,3469.44 r0 top
R54 "10K" Res-0603 1145.35,3525.23 r180 top
R55 "0R" Res-0603 982.38,3471.44 r0 top
R56 "30K" Res-0603 1259.53,3469.44 r0 top
R57 "0R" Res-0603 1619.92,3854.08 r0 top
R58 "0R" Res-0603 2419.53,4248.09 r270 top
R59 "20K" Res-0603 1647.1,4167.36 r90 top
R60 "10K" Res-0603 1535.23,4167.36 r90 top
R61 "51R" Res-0603 2476.26,4138.04 r270 top
R62 "20K" Res-0603 2476.26,4431.94 r270 top
R63 "10K" Res-0603 2363.91,4431.94 r270 top
R64 "73.2K" Res-0603 1479.29,4167.36 r270 top value=73.2kR
R65 "30K" Res-0603 1619.92,4021.9 r0 top
R66 "37.4K" Res-0603 2419.53,4431.94 r270 top
R67 "1.87K" Res-0402 2577.14,1282.58 r270 top
R68 "4.99K" Res-0402 2620.14,1282.58 r90 top value=4.99kR
R69 "140K" Res-0603 875.01,3841.51 r180 top
R70 "100K" Res-0603 875.01,3777.77 r180 top value=100kR
R71 "100K" Res-0603 875.01,3714.03 r180 top value=100kR
R72 "100K" Res-0603 875.01,3650.29 r180 top value=100kR
R73 "20K" Res-0603 983.38,3841.51 r180 top
R74 "51K" Res-0603 983.38,3777.77 r180 top value=51kR
R75 "51K" Res-0603 983.38,3714.03 r180 top value=51kR
R76 "51K" Res-0603 983.38,3650.29 r180 top value=51kR
R77 "680R" Res-0603 540,733.78 r270 top
R78 "820R" Res-0603 1141.73,3106.3 r270 top
R79 "499R" Res-0603 1220.47,3106.3 r270 top
R80 "100R" Res-0603 1299.21,3106.3 r270 top
R81 "680R" Res-0603 1377.95,3245 r90 top
R82 "4.7K" Res-0402 589.72,1834.92 r180 bottom
R83 "820R" Res-0603 755.24,2266.33 r0 bottom
R84 "0R" Res-0603 469.14,1996.25 r180 bottom
R85 "DNP" Res-0603 581.74,2052.48 r0 bottom
R86 "10R" Res-0603 469.14,2051.99 r180 bottom
R87 "9.53K" Res-0402 2663,1282.58 r90 top value=9.53kR
R88 "90.9K" Res-0603 2793.18,1925.22 r270 top
R89 "10K" Res-0603 2739.41,1925.22 r270 top
R90 "4.7K" Res-0402 2954.98,1282.58 r90 top
R91 "4.7K" Res-0402 2996.59,1282.58 r90 top
R92 "4.7K" Res-0402 2874.1,1736.88 r270 bottom
R93 "1M" Res-0603 3106.12,1493.39 r90 top
R94 "4.7K" Res-0402 2754.41,1736.88 r270 bottom
R95 "1K" Res-0603 2686,1925.22 r270 top
R96 "0R" Res-0402 2620,3297.25 r180 top
R97 "680R" Res-0603 1051.81,340.08 r270 top
R98 "680R" Res-0603 1051.81,733.78 r270 top
R99 "DNP" Res-0603 4091.5,3510.1 r0 top
R100 "10K" Res-0603 4091.5,3451.05 r0 top
R101 "0R" Res-0402 3046.56,4389.77 r270 top
R102 "47K" Res-0603 2201.79,3739.84 r180 top value=47kR
R103 "DNP" Res-0603 4093.54,3196.85 r0 top
R104 "0R" Res-0603 2202.11,3688.34 r180 top
R105 "22R" Res-0603 2380,3446.02 r180 top
R106 "22R" Res-0603 2380,3500.16 r180 top
R107 "22R" Res-0603 2380,3592.82 r180 top
R108 "22R" Res-0603 2380,3647 r180 top
R109 "0R" Res-0402 4000,4065.93 r180 top
R110 "DNP" Res-0603 4094,3080 r180 top
R111 "4.7K" Res-0603 4093.54,3137.8 r0 top
R112 "DNP" Res-0603 3429.13,4507.88 r90 top
R113 "DNP" Res-0402 3271.34,4389.77 r270 top
R114 "680R" Res-0603 2677.16,3842.52 r90 bottom
R117 "0R" Res-0402 4174.17,3346.56 r0 top
R118 "0R" Res-0603 1165.68,4516 r90 top
R119 "DNP" Res-0603 1107.25,4516 r90 top
R120 "680R" Res-0603 683.02,568.51 r270 bottom
R121 "680R" Res-0603 540,340.08 r270 top
R122 "10M" Res-0402 2650.92,2279.89 r225 top
R123 "20K" Res-0603 1683.15,4186.01 r0 bottom
R124 "20K" Res-0603 1984.93,4186.01 r0 bottom
R125 "20K" Res-0603 486.21,3886.18 r270 top
R126 "20K" Res-0603 1519.91,4404.94 r0 bottom
R127 "20K" Res-0603 2144.74,4404.94 r0 bottom
R128 "820R" Res-0603 1422.35,3650.32 r270 bottom
SB1 "Solder Bridge 0603" "Solder Bridge" 581.74,2120 r180 bottom
SW1 "FSM6JSMATR" FSM6JSMATR 3748.03,535.43 r0 top
SW2 "TS-1088-AR02016" TS-1088-AR02016 1595.06,1583.75 r180 top
SW3 "TS-1002S-12026C" TS-1002S-12026C 1925.2,877.95 r270 top
SW4 "TS-1002S-12026C" TS-1002S-12026C 2358.26,877.96 r270 top
SW5 "TS-1002S-12026C" TS-1002S-12026C 2789.68,876.39 r270 top
SW6 "TS-1002S-12026C" TS-1002S-12026C 3224.41,878.04 r270 top
TP1 "TEST POINT 0.5mm Dia" "Test-point - 0.5mm"#1 2938.06,2456.66 r90 top
TP2 "TEST POINT 0.5mm Dia" "Test-point - 0.5mm"#1 2938.06,2387.56 r90 top
TP3 "TEST POINT 0.5mm Dia" "Test-point - 0.5mm"#1 2938.06,2320.06 r90 top
TP4 "TEST POINT 0.5mm Dia" "Test-point - 0.5mm"#1 2938.06,2250.06 r90 top
TP5 "TEST POINT 0.5mm Dia" "Test-point - 0.5mm"#1 2938.06,2110.78 r90 top
TP6 "TEST POINT 0.5mm Dia" "Test-point - 0.5mm"#1 2938.06,2180.06 r90 top
TP7 "TEST POINT 0.5mm Dia" "Test-point - 0.5mm"#2 2327.09,1170 r0 top
TP8 "TEST POINT 0.5mm Dia" "Test-point - 0.5mm"#1 3942.06,2947.83 r90 top
TP9 "TEST POINT 0.5mm Dia" "Test-point - 0.5mm"#1 3234.68,1751.09 r270 top
TP10 "TEST POINT 0.5mm Dia" "Test-point - 0.5mm"#1 3942.06,2872.84 r90 top
TP11 "TEST POINT 0.5mm Dia" "Test-point - 0.5mm"#1 3234.68,1819.86 r270 top
TP12 "TEST POINT 0.5mm Dia" "Test-point - 0.5mm"#1 3234.68,1682.33 r270 top
TP13 "TEST POINT 0.5mm Dia" "Test-point - 0.5mm"#1 3234.68,1888.63 r270 top
TP14 "TEST POINT 0.5mm Dia" "Test-point - 0.5mm"#1 3234.68,1957.39 r270 top
TP15 "TEST POINT 0.5mm Dia" "Test-point - 0.5mm"#1 3234.69,2026.16 r270 top
U1 "V3s" LQFP-128-EP(14x14) 2166.14,2363.53 r315 top
U2 "W25Q128JVEIQ" WSON-8-EP(6x8) 1650.19,1807.09 r180 top
U3 "PCF8563T/5,518" "SOIC-8(0.154\", 3.90mm Width)" 672.06,1570.92 r180 top
U4 "CH340C" SOP-16 1147.57,1459.82 r180 top
U5 "TPS62933DRLR" SOT-583 322.28,3183.36 r270 bottom
U6 "TPS65261RHBR" "32-QFN (5x5)" 1275.59,3870.08 r45 top
U7 "TPS563202DRLR" SOT-563 2309,4306.74 r0 top
U8 "TPS74801RGWR" "20-VQFN (5x5)" 2275.91,1320.42 r270 top
U9 "XC6206P302MR-G" SOT-23 1635.51,3244.14 r0 top
U10 "TPS7A4533DCQR" SOT-223-6_ 2077,1634 r0 top
U11 "NS2009" 10-MSOP 185.07,2974.19 r0 top
U12 "TPS61158DRVR" WSON-6-EP(2x2) 579.8,1957.24 r90 bottom
U13 "TUSB4020BIPHPR" "48-HTQFP (7x7)" 2843.78,1601.05 r270 top
U14 "EC21EFA-512-STD" EC21EFA-512-STD 3287.4,3622.05 r90 top
U15 "TXS0108EPWR" TSSOP-20 2122.43,3519.05 r180 top
U17 "USBLC6-2SC6" SOT-23-6 1214.93,1551.4 r0 bottom
U18 "ISO6742FDWR" SOIC-16-300mil 1840,4429.94 r0 bottom
U19 "VRB1212S-10WR3" VRB1212S-10WR3 567.18,3684.86 r270 bottom
U20 "AP63203WU-7" TSOT-23-6 1560,4495 r180 top
X1 "24MHz" SMD3225-4P 2425.2,1960.63 r225 top
X2 "32.768kHz" SMD3215-2P 2698.93,2234.09 r225 top
X3 "32.768kHz" SMD3215-2P 887.21,1520.32 r90 top
X4 "24MHz" SMD5032-4P 3238.22,1444.15 r90 top

## Footprints (in the part's own frame and the unit in brackets; to place one, negate y for a bottom-side part, rotate by r counter-clockwise, add the part's x,y. Pads: shape width x height; smd on the part's side, far side on the other; paste and mask are expansions set on the pad)
"2-X1SON (1x.60)" [mm]
  rect 0.6x0.5 smd: 1(-0.5,0) 2(0.5,0)
  silkscreen extent -1.14,-0.38 1.14,0.41, body extent -0.5,-0.3 0.5,0.3, height 0.45
10-MSOP [mm]
  rect 1.4x0.3 smd: 1(-2.2,1) 2(-2.2,0.5) 3(-2.2,0) 4(-2.2,-0.5) 5(-2.2,-1) 6(2.2,-1) 7(2.2,-0.5) 8(2.2,0) 9(2.2,0.5) 10(2.2,1)
  silkscreen extent -3.17,-1.55 1.47,1.55, body extent -2.45,-1.5 2.45,1.5, height 1.07
"20-VQFN (5x5)" [mm]
  rect 1.087x0.364 smd paste-100 mask+0.051: 1(-2.468,1.3) 2(-2.469,0.65) 3(-2.469,0) 4(-2.468,-0.65) 5(-2.469,-1.3) 11(2.468,-1.3) 12(2.468,-0.65) 13(2.468,0) 14(2.468,0.65) 15(2.468,1.3)
  rect 0.364x1.087 smd paste-100 mask+0.051: 6(-1.3,-2.468) 7(-0.65,-2.468) 8(0,-2.468) 9(0.65,-2.468) 10(1.3,-2.469) 16(1.3,2.468) 17(0.65,2.468) 18(0,2.468) 19(-0.65,2.468) 20(-1.3,2.468)
  rect 3.15x3.15 smd paste-100 mask+0.051: 21(0,0)
  silkscreen extent -3.31,-2.55 2.55,2.55, body extent -2.5,-2.5 2.5,2.5, height 1
"32-QFN (5x5)" [mm]
  rect 0.7x0.25 smd: 1(-2.435,1.75) 2(-2.435,1.25) 3(-2.435,0.75) 4(-2.435,0.25) 5(-2.435,-0.25) 6(-2.435,-0.75) 7(-2.435,-1.25) 8(-2.435,-1.75) 17(2.435,-1.75) 18(2.435,-1.25) 19(2.435,-0.75) 20(2.435,-0.25) 21(2.435,0.25) 22(2.435,0.75) 23(2.435,1.25) 24(2.435,1.75)
  rect 0.25x0.7 smd: 9(-1.75,-2.435) 10(-1.25,-2.435) 11(-0.75,-2.435) 12(-0.25,-2.435) 13(0.25,-2.435) 14(0.75,-2.435) 15(1.25,-2.435) 16(1.75,-2.435) 25(1.75,2.435) 26(1.25,2.435) 27(0.75,2.435) 28(0.25,2.435) 29(-0.25,2.435) 30(-0.75,2.435) 31(-1.25,2.435) 32(-1.75,2.435)
  rect 3.45x3.45 smd paste-3: 33(0,0)
  silkscreen extent -3.17,-2.5 2.5,2.5, body extent -2.5,-2.5 2.5,2.5, height 0.6
"48-HTQFP (7x7)" [mm]
  rect 1.6x0.3 smd mask+0.08: 1(-4.25,2.75) 2(-4.25,2.25) 3(-4.25,1.75) 4(-4.25,1.25) 5(-4.25,0.75) 6(-4.25,0.25) 7(-4.25,-0.25) 8(-4.25,-0.75) 9(-4.25,-1.25) 10(-4.25,-1.75) 11(-4.25,-2.25) 12(-4.25,-2.75) 25(4.25,-2.75) 26(4.25,-2.25) 27(4.25,-1.75) 28(4.25,-1.25) 29(4.25,-0.75) 30(4.25,-0.25) 31(4.25,0.25) 32(4.25,0.75) 33(4.25,1.25) 34(4.25,1.75) 35(4.25,2.25) 36(4.25,2.75)
  rect 0.3x1.6 smd mask+0.08: 13(-2.75,-4.25) 14(-2.25,-4.25) 15(-1.75,-4.25) 16(-1.25,-4.25) 17(-0.75,-4.25) 18(-0.25,-4.25) 19(0.25,-4.25) 20(0.75,-4.25) 21(1.25,-4.25) 22(1.75,-4.25) 23(2.25,-4.25) 24(2.75,-4.25) 37(2.75,4.25) 38(2.25,4.25) 39(1.75,4.25) 40(1.25,4.25) 41(0.75,4.25) 42(0.25,4.25) 43(-0.25,4.25) 44(-0.75,4.25) 45(-1.25,4.25) 46(-1.75,4.25) 47(-2.25,4.25) 48(-2.75,4.25)
  rect 5.5x5.5 smd mask+0.08: 49(0,0)
  silkscreen extent -5.38,-3.74 3.82,3.74, body extent -4.5,-4.5 4.5,4.5, height 1.2
5027740891 [mm]
  rect 0.8x1.68 smd: 1(-2.952,7.335) 2(-1.852,7.335) 3(-0.753,7.335) 4(0.347,7.335) 5(1.448,7.335) 6(2.548,7.335) 7(3.648,7.335) 8(4.748,7.335)
  rect 1.29x1.4 smd: DN(6.803,5.775) SN(6.803,-1.625)
  rect 1.5x1.7 smd: SH1(-6.802,-7.425) SH2(6.697,-7.425)
  rect 1.6x1.5 smd: SH3(6.148,7.425) SH4(-6.502,7.425)
  silkscreen extent -7.2,-8.05 7.1,6.95, body extent -7.3,-8.19 7,7.81, height 1.8
B8B-XH-A(LF)(SN) [mm]
  rect 1.8x1.8 hole 1: 1(-8.75,0)
  round 1.8 hole 1: 2(-6.25,0) 3(-3.75,0) 4(-1.25,0) 5(1.25,0) 6(3.75,0) 7(6.25,0) 8(8.75,0)
  silkscreen extent -11.2,-3.47 11.2,2.28, body extent -11.2,-3.47 11.2,2.28, height 7
Cap-0402 [mil]
  rect 18x25 smd mask+2.36: 1(-18.5,0) 2(18.5,0)
  silkscreen extent -31,-16 31,16, body extent -20,-10 20,10, height 19
Cap-0603 [mil]
  rect 30x35 smd mask+2.36: 1(-30,0) 2(30,0)
  silkscreen extent -49,-21 49,21, body extent -32,-16 31,16, height 34
Cap-0805 [mil] "SMD 0805"
  rect 40x60 smd mask+2.76: 1(-40,0) 2(40,0)
  silkscreen extent -64,-34 64,34, body extent -39,-25 39,25, height 30
Cap-1206 [mil] "SMD 1206"
  rect 60x70 smd: 1(-50,0) 2(50,0)
  silkscreen extent -84,-39 84,39, body extent -63,-31 63,32, height 39
Cap-1210 [mil] "SMD 1210"
  rect 60x110 smd: 1(-50,0) 2(50,0)
  silkscreen extent -84,-59 84,59, body extent -63,-49 63,49, height 39
Case-A [mm]
  rect 1.42x1.13 smd: 1(-1.2,0) 2(1.2,0)
  silkscreen extent -1.63,-0.97 1.63,0.97, body extent -1.6,-0.9 1.6,0.9, height 1.8
Case-D [mm]
  rect 2.4x2.9 smd: 1(-3.05,0) 2(3.05,0)
  silkscreen extent -3.65,-2.15 3.65,2.15, body extent -3.7,-2.22 3.7,2.22, height 3.01
EC21EFA-512-STD [mm]
  rect 2.5x0.8 smd: 1(-15.75,12.6) 2(-15.75,11.3) 3(-15.75,10) 4(-15.75,8.7) 5(-15.75,7.4) 6(-15.75,6.1) 7(-15.75,4.8) 8(-15.75,0.4) 9(-15.75,-0.9) 10(-15.75,-2.2) 11(-15.75,-3.5) 12(-15.75,-4.8) 13(-15.75,-6.1) 14(-15.75,-7.4) 15(-15.75,-8.7) 16(-15.75,-10) 17(-15.75,-11.3) 18(-15.75,-12.6) 37(15.75,-12.6) 38(15.75,-11.3) 39(15.75,-10) 40(15.75,-8.7) 41(15.75,-7.4) 42(15.75,-6.1) 43(15.75,-4.8) 44(15.75,-3.5) 45(15.75,-2.2) 46(15.75,-0.9) 47(15.75,0.4) 48(15.75,4.8) 49(15.75,6.1) 50(15.75,7.4) 51(15.75,8.7) 52(15.75,10) 53(15.75,11.3) 54(15.75,12.6) 141(-15.75,3) 142(-15.75,1.7) 143(15.75,1.7) 144(15.75,3)
  rect 0.8x2.5 smd: 19(-9.55,-14.25) 20(-8.25,-14.25) 21(-6.95,-14.25) 22(-5.65,-14.25) 23(-4.35,-14.25) 24(-3.05,-14.25) 25(-1.75,-14.25) 26(-0.45,-14.25) 27(0.85,-14.25) 28(2.15,-14.25) 29(3.45,-14.25) 30(4.75,-14.25) 31(6.05,-14.25) 32(7.35,-14.25) 33(8.65,-14.25) 34(9.95,-14.25) 35(11.25,-14.25) 36(12.55,-14.25) 55(12.55,14.25) 56(11.25,14.25) 57(9.95,14.25) 58(8.65,14.25) 59(7.35,14.25) 60(6.05,14.25) 61(4.75,14.25) 62(3.45,14.25) 63(2.15,14.25) 64(0.85,14.25) 65(-0.45,14.25) 66(-1.75,14.25) 67(-3.05,14.25) 68(-4.35,14.25) 69(-5.65,14.25) 70(-6.95,14.25) 71(-8.25,14.25) 72(-9.55,14.25) 113(-10.85,14.25) 114(-12.15,14.25) 115(-10.85,-14.25) 116(-12.15,-14.25)
  rect 2x3 smd: 85(8.2,9.6) 86(8.2,4.8) 87(8.2,0) 88(8.2,-4.8) 89(8.2,-9.6) 90(5,9.6) 91(5,4.8) 92(5,0) 93(5,-4.8) 94(5,-9.6) 95(1.6,9.6) 96(1.6,4.8) 97(1.6,-4.8) 98(1.6,-9.6) 99(-1.6,9.6) 100(-1.6,4.8) 101(-1.6,-4.8) 102(-1.6,-9.6) 103(-5,9.6) 104(-5,4.8) 105(-5,0) 106(-5,-4.8) 107(-5,-9.6) 109(-8.2,4.8) 110(-8.2,0) 111(-8.2,-4.8) 112(-8.2,-9.6)
  rect 1x2 smd: 108(-8.2,9.6)
  rect 1.1x1.1 smd: 117(-11,11) 118(-11,9) 119(-11,7) 120(-11,5) 121(-11,3) 122(-11,1) 123(-11,-1) 124(-11,-3) 125(-11,-5) 126(-11,-7) 127(-11,-9) 128(-11,-11) 129(-13,11) 130(-13,9) 131(-13,7) 132(-13,5) 133(-13,3) 134(-13,1) 135(-13,-1) 136(-13,-3) 137(-13,-5) 138(-13,-7) 139(-13,-9) 140(-13,-11)
  Top Layer region: -7.2,8.1 -9.2,8.1 -9.2,10.6 -8.7,11.1 -7.2,11.1
  Keep-Out Layer region: 3.5,-2.8 -3.5,-2.8 -3.5,2.8 3.5,2.8
  silkscreen extent -17.46,-14.5 16,14.5, body extent -16,-14.5 16,14.5, height 2.6
ETQP3M6R8KVN [mm]
  rect 2.1x3.2 smd paste+0 mask+0.051: 1(-2.8,0) 2(2.8,0)
  silkscreen extent -3.2,-3 3.2,3, body extent -3.2,-3 3.2,3.01, height 3
FH41-40S-0.5SH(05) [mil]
  rect 12x40 smd paste+0 mask+1.97: 1(-383.86,113.68) 2(-364.18,113.68) 3(-344.49,113.68) 4(-324.81,113.68) 5(-305.13,113.68) 6(-285.44,113.68) 7(-265.75,113.68) 8(-246.07,113.68) 9(-226.38,113.68) 10(-206.69,113.68) 11(-187.01,113.68) 12(-167.32,113.68) 13(-147.64,113.68) 14(-127.95,113.68) 15(-108.27,113.68) 16(-88.59,113.68) 17(-68.9,113.68) 18(-49.22,113.68) 19(-29.53,113.68) 20(-9.85,113.68) 21(9.84,113.68) 22(29.52,113.68) 23(49.22,113.68) 24(68.9,113.68) 25(88.59,113.68) 26(108.26,113.68) 27(127.95,113.68) 28(147.63,113.68) 29(167.32,113.68) 30(187,113.68) 31(206.69,113.68) 32(226.38,113.68) 33(246.06,113.68) 34(265.74,113.68) 35(285.43,113.68) 36(305.11,113.68) 37(324.81,113.68) 38(344.49,113.68) 39(364.17,113.68) 40(383.85,113.68)
  rect 18x60 smd paste+0 mask+1.97: 41(-344.49,-113.68) 42(-246.07,-113.68) 43(-147.64,-113.68) 44(-49.21,-113.68) 45(49.2,-113.68) 46(147.65,-113.68) 47(246.06,-113.68) 48(344.49,-113.68)
  rect 30x80 smd paste+0 mask+1.97: 49(433.07,-93.01) 50(-433.08,-93.01)
  silkscreen extent -472,-114 472,124, body extent -472,-127 472,119, height 98
FNR4030S3R9MT [mm]
  rect 1.1x3.7 smd: 1(-1.5,0) 2(1.5,0)
  silkscreen extent -2,-2 2,2, body extent -2,-2 2,2, height 2.61
FSM6JSMATR [mm]
  rect 2.1x1.4 smd: 1(-4.55,2.25) 2(4.55,2.25) 3(-4.55,-2.25) 4(4.55,-2.25)
  silkscreen extent -5.91,-3 3,3, body extent -5,-3 5,3, height 7.26
FUET-5025 [mm]
  rect 1.8x1 smd: 1(-1.75,-1.75) 2(1.75,-1.75)
  rect 2x1 smd: 3(-1.75,1.75)
  silkscreen extent -2.5,-2.5 2.5,2.5, body extent -2.5,-2.5 2.5,2.51, height 2.51
"HX0.5-10P XJH2.0 043" [mm]
  rect 0.25x1.5 smd paste+0 mask+0.051: 1(2.25,1.3) 2(1.75,1.3) 3(1.25,1.3) 4(0.75,1.3) 5(0.25,1.3) 6(-0.25,1.3) 7(-0.75,1.3) 8(-1.25,1.3) 9(-1.75,1.3) 10(-2.25,1.3)
  rect 2x1.7 smd paste+0 mask+0.051: MP1(-3.95,-1.3) MP2(3.95,-1.3)
  silkscreen extent -4.74,-4.36 4.74,0.85, body extent -4.71,-4.4 4.7,1.6, height 2.02
"IND-0603 (1608 Metric)" [mm] "0.063\" L x 0.032\" W (1.60mm x 0.80mm)"
  rect 0.6x0.8 smd: 1(-0.7,0) 2(0.7,0)
  silkscreen extent -0.2,-0.46 0.23,0.46, body extent -0.8,-0.4 0.8,0.4, height 0.78
LED-0603 [mm]
  rect 0.5x1 smd: 1(-0.75,0) 2(0.75,0)
  silkscreen extent -1.12,-0.66 1.75,0.66, body extent -0.82,-0.37 0.82,0.36, height 0.68
LQFP-128-EP(14x14) [mm]
  rect 1.5x0.2 smd mask+0.07: 1(-7.6,6.2) 2(-7.6,5.8) 3(-7.6,5.4) 4(-7.6,5) 5(-7.6,4.6) 6(-7.6,4.2) 7(-7.6,3.8) 8(-7.6,3.4) 9(-7.6,3) 10(-7.6,2.6) 11(-7.6,2.2) 12(-7.6,1.8) 13(-7.6,1.4) 14(-7.6,1) 15(-7.6,0.6) 16(-7.6,0.2) 17(-7.6,-0.2) 18(-7.6,-0.6) 19(-7.6,-1) 20(-7.6,-1.4) 21(-7.6,-1.8) 22(-7.6,-2.2) 23(-7.6,-2.6) 24(-7.6,-3) 25(-7.6,-3.4) 26(-7.6,-3.8) 27(-7.6,-4.2) 28(-7.6,-4.6) 29(-7.6,-5) 30(-7.6,-5.4) 31(-7.6,-5.8) 32(-7.6,-6.2) 65(7.6,-6.2) 66(7.6,-5.8) 67(7.6,-5.4) 68(7.6,-5) 69(7.6,-4.6) 70(7.6,-4.2) 71(7.6,-3.8) 72(7.6,-3.4) 73(7.6,-3) 74(7.6,-2.6) 75(7.6,-2.2) 76(7.6,-1.8) 77(7.6,-1.4) 78(7.6,-1) 79(7.6,-0.6) 80(7.6,-0.2) 81(7.6,0.2) 82(7.6,0.6) 83(7.6,1) 84(7.6,1.4) 85(7.6,1.8) 86(7.6,2.2) 87(7.6,2.6) 88(7.6,3) 89(7.6,3.4) 90(7.6,3.8) 91(7.6,4.2) 92(7.6,4.6) 93(7.6,5) 94(7.6,5.4) 95(7.6,5.8) 96(7.6,6.2)
  rect 0.2x1.5 smd mask+0.07: 33(-6.2,-7.6) 34(-5.8,-7.6) 35(-5.4,-7.6) 36(-5,-7.6) 37(-4.6,-7.6) 38(-4.2,-7.6) 39(-3.8,-7.6) 40(-3.4,-7.6) 41(-3,-7.6) 42(-2.6,-7.6) 43(-2.2,-7.6) 44(-1.8,-7.6) 45(-1.4,-7.6) 46(-1,-7.6) 47(-0.6,-7.6) 48(-0.2,-7.6) 49(0.2,-7.6) 50(0.6,-7.6) 51(1,-7.6) 52(1.4,-7.6) 53(1.8,-7.6) 54(2.2,-7.6) 55(2.6,-7.6) 56(3,-7.6) 57(3.4,-7.6) 58(3.8,-7.6) 59(4.2,-7.6) 60(4.6,-7.6) 61(5,-7.6) 62(5.4,-7.6) 63(5.8,-7.6) 64(6.2,-7.6) 97(6.2,7.6) 98(5.8,7.6) 99(5.4,7.6) 100(5,7.6) 101(4.6,7.6) 102(4.2,7.6) 103(3.8,7.6) 104(3.4,7.6) 105(3,7.6) 106(2.6,7.6) 107(2.2,7.6) 108(1.8,7.6) 109(1.4,7.6) 110(1,7.6) 111(0.6,7.6) 112(0.2,7.6) 113(-0.2,7.6) 114(-0.6,7.6) 115(-1,7.6) 116(-1.4,7.6) 117(-1.8,7.6) 118(-2.2,7.6) 119(-2.6,7.6) 120(-3,7.6) 121(-3.4,7.6) 122(-3.8,7.6) 123(-4.2,7.6) 124(-4.6,7.6) 125(-5,7.6) 126(-5.4,7.6) 127(-5.8,7.6) 128(-6.2,7.6)
  rect 5x5 smd mask+0.07: 129(0,0)
  silkscreen extent -8.64,-6.25 6.25,6.33, body extent -8,-8 8,8, height 1.61
MicroSMP [mm]
  rect 2x1.1 smd paste+0 mask+0.051: 1(-0.95,0)
  rect 0.8x0.8 smd paste+0 mask+0.051: 2(0.95,0)
  silkscreen extent -1.09,-0.76 1.75,0.76, body extent -1.25,-0.65 1.25,0.65, height 0.66
Res-0402 [mil]
  rect 18x25 smd mask+2.17: 1(-18.5,0) 2(18.5,0)
  silkscreen extent -32,-17 32,16, body extent -23,-11 23,11, height 16
Res-0603 [mil]
  rect 30x35 smd: 1(-30,0) 2(30,0)
  silkscreen extent -48,-21 48,21, body extent -31,-17 31,17, height 18
"SC EB 5R5 474 M" [mm]
  rect 1.2x2.2 hole 0.6 square: 1(-2.5,0) 2(2.5,0)
  silkscreen extent -6.75,-6.75 6.75,6.75, body extent -6.75,-6.75 6.75,6.75, height 7
SMB_ [mm]
  rect 2.8x2.4 smd: 1(-2.3,0) 2(2.3,0)
  silkscreen extent -2.21,-1.9 4.83,1.91, body extent -2.7,-1.8 2.7,1.8, height 2.3
SMD3215-2P [mm]
  rect 1x1.8 smd: 1(-1.25,0) 2(1.25,0)
  silkscreen extent -0.56,-0.81 0.56,0.81, body extent -1.6,-0.75 1.6,0.75, height 0.8
SMD3225-4P [mm]
  rect 1.4x1.2 smd: 1(-1.1,-0.85) 2(1.1,-0.85) 3(1.1,0.85) 4(-1.1,0.85)
  silkscreen extent -2.08,-1.3 1.65,1.3, body extent -1.6,-1.25 1.6,1.25, height 0.81
SMD5032-4P [mm]
  rect 2x1.4 smd: 1(-2.05,-1.2) 2(2.05,-1.2) 3(2.05,1.2) 4(-2.05,1.2)
  silkscreen extent -3.35,-1.65 2.54,1.65, body extent -2.5,-1.6 2.5,1.6, height 1.12
SOD-123 [mm]
  rect 0.95x0.9 smd: 1(-1.575,0) 2(1.575,0)
  silkscreen extent -1.37,-0.8 2.82,0.8, body extent -1.82,-0.78 1.83,0.78, height 1.5
SOD-123FL [mm]
  rect 1.34x1.8 smd: 1(-1.43,0) 2(1.43,0)
  silkscreen extent -3.25,-1.17 2.26,1.17, body extent -1.8,-0.82 1.8,0.82, height 0.95
"SOD-523 (Bi-Directional)" [mm]
  rect 0.6x0.4 smd: 1(-0.75,0) 2(0.75,0)
  silkscreen extent -0.65,-0.5 0.65,0.5, body extent -0.8,-0.4 0.8,0.4, height 0.7
SOD-523F [mm]
  rect 0.8x0.52 smd: 1(-1,0) 2(1,0)
  silkscreen extent -0.64,-0.51 1.78,0.51, body extent -0.8,-0.4 0.8,0.4, height 0.7
"SOIC-8(0.154\", 3.90mm Width)" [mm]
  rect 1.55x0.6 smd: 1(-2.7,1.905) 2(-2.7,0.635) 3(-2.7,-0.635) 4(-2.7,-1.905) 5(2.7,-1.905) 6(2.7,-0.635) 7(2.7,0.635) 8(2.7,1.905)
  silkscreen extent -3.79,-2.51 1.8,2.51, body extent -3.01,-2.45 3.01,2.45, height 1.63
SOIC-16-300mil [mm]
  rect 1.65x0.6 smd paste+0 mask+0.07: 1(-4.875,4.445) 2(-4.875,3.175) 3(-4.875,1.905) 4(-4.875,0.635) 5(-4.875,-0.635) 6(-4.875,-1.905) 7(-4.875,-3.175) 8(-4.875,-4.445) 9(4.875,-4.445) 10(4.875,-3.175) 11(4.875,-1.905) 12(4.875,-0.635) 13(4.875,0.635) 14(4.875,1.905) 15(4.875,3.175) 16(4.875,4.445)
  silkscreen extent -6,-5.21 3.84,5.21, body extent -5.15,-5.15 5.15,5.15, height 2.65
"Solder Bridge" [mil] "Solder Bridge ON"
  rect 30x35 smd: 1(-30,0) 2(30,0)
  silkscreen extent -50,-22 50,22
SOP-16 [mil]
  rect 57.55x22 smd: 1(-107.27,175) 2(-107.27,125) 3(-107.27,75) 4(-107.27,25) 5(-107.27,-25) 6(-107.27,-75) 7(-107.27,-125) 8(-107.27,-175) 9(107.27,-175) 10(107.27,-125) 11(107.27,-75) 12(107.27,-25) 13(107.27,25) 14(107.27,75) 15(107.27,125) 16(107.27,175)
  silkscreen extent -149,-199 84,199, body extent -122,-197 122,197, height 69
SOT-23 [mm] "TRANS NPN 40V 0.6A SOT23"
  rect 0.82x0.92 smd: 1(-0.95,-1) 2(0.95,-1) 3(0,1)
  silkscreen extent -1.68,-1.3 1.55,0.81, body extent -1.5,-1.25 1.5,1.25, height 1.05
sot-23 [mm] "TRANS NPN 40V 0.6A SOT23"
  rect 0.82x0.92 smd: 1(-0.95,-1) 2(0.95,-1) 3(0,1)
  silkscreen extent -1.68,-1.3 1.55,0.81, body extent -1.5,-1.25 1.5,1.25, height 1.05
SOT-23-6 [mm]
  rect 1.22x0.62 smd: 1(-1.31,0.95) 2(-1.31,0) 3(-1.31,-0.95) 4(1.31,-0.95) 5(1.31,0) 6(1.31,0.95)
  silkscreen extent -2.18,-1.52 0.86,1.52, body extent -1.5,-1.5 1.5,1.5, height 1.47
SOT-223-6_ [mm]
  rect 0.55x2.15 smd: 1(-2.54,-3.1) 2(-1.27,-3.1) 3(0,-3.1) 4(1.27,-3.1) 5(2.54,-3.1)
  rect 3.5x2.2 smd: 6(0,3.1)
  silkscreen extent -3.33,-4.51 3.33,1.84, body extent -3.27,-3.63 3.27,3.63, height 1.8
SOT-416 [mm]
  rect 0.46x0.65 smd: 1(0.5,-0.525) 2(-0.5,-0.525) 3(0,0.525)
  silkscreen extent -0.81,-0.65 1.03,0.41, body extent -0.8,-0.8 0.8,0.8, height 0.75
SOT-563 [mm]
  rect 0.67x0.3 smd mask+0.07: 1(-0.638,0.5) 2(-0.638,0) 3(-0.638,-0.5) 4(0.638,-0.5) 5(0.638,0) 6(0.638,0.5)
  silkscreen extent -1.22,-0.9 0.74,0.9, body extent -0.85,-0.85 0.85,0.85, height 0.61
SOT-583 [mm]
  rect 0.67x0.32 smd mask+0.055: 1(-0.735,0.75) 2(-0.735,0.25) 3(-0.735,-0.25) 4(-0.735,-0.75) 5(0.735,-0.75) 6(0.735,-0.25) 7(0.735,0.25) 8(0.735,0.75)
  silkscreen extent -1.32,-1.1 0.6,1.1, body extent -0.8,-1.05 0.8,1.05, height 0.6
SRN4018-4R7M [mm]
  rect 1.4x4.2 smd paste+0 mask+0.05: 1(-1.4,0) 2(1.4,0)
  silkscreen extent -0.48,-2.1 0.45,2.1, body extent -2,-2.02 2,2.02, height 1.83
"Test-point - 0.5mm"#1 [mm]
  oct 1x1 smd: 1(0,0)
  silkscreen extent -0.68,-0.68 0.68,0.68
"Test-point - 0.5mm"#2 [mm]
  round 0.75 smd: 1(0,0)
"TH LED 5mm Green" [mm]
  rect 1.6x1.6 hole 0.9: 1(-1.27,0)
  round 1.6 hole 0.9: 2(1.27,0)
  silkscreen extent -2.47,-3 3,3, body extent -2.5,-3 3,3, height 9.44
"TH LED 5mm Yellow" [mm]
  rect 1.6x1.6 hole 0.9: 1(-1.27,0)
  round 1.6 hole 0.9: 2(1.27,0)
  silkscreen extent -2.47,-3 3,3, body extent -2.5,-3 3,3, height 9.44
"TH LED 5mm_" [mm]
  rect 1.6x1.6 hole 0.9: 1(-1.27,0)
  round 1.6 hole 0.9: 2(1.27,0)
  silkscreen extent -2.47,-3 3,3, body extent -2.5,-3 3,3, height 9.44
TS-1002S-12026C [mm]
  rect 2.3x1.5 smd: 1(-4.55,2.25) 2(4.55,2.25) 3(-4.55,-2.25) 4(4.55,-2.25)
  silkscreen extent -3,-3 3,3
TS-1088-AR02016 [mm]
  rect 1.23x1.36 smd: 1(-2.185,0) 2(2.185,0)
  silkscreen extent -2.03,-1.54 2.03,1.54, body extent -2.4,-1.45 2.4,1.45, height 1.95
TSOT-23-6 [mm]
  rect 1x0.6 smd: 1(-1.2,0.95) 2(-1.2,0) 3(-1.2,-0.95) 4(1.2,-0.95) 5(1.2,0) 6(1.2,0.95)
  silkscreen extent -1.98,-1.5 0.86,1.5, body extent -1.41,-1.45 1.41,1.45, height 1
TSSOP-20 [mm]
  rect 1.6x0.32 smd: 1(-2.8,2.925) 2(-2.8,2.275) 3(-2.8,1.625) 4(-2.8,0.975) 5(-2.8,0.325) 6(-2.8,-0.325) 7(-2.8,-0.975) 8(-2.8,-1.625) 9(-2.8,-2.275) 10(-2.8,-2.925) 11(2.8,-2.925) 12(2.8,-2.275) 13(2.8,-1.625) 14(2.8,-0.975) 15(2.8,-0.325) 16(2.8,0.325) 17(2.8,0.975) 18(2.8,1.625) 19(2.8,2.275) 20(2.8,2.925)
  silkscreen extent -3.88,-3.3 1.95,3.3, body extent -3.2,-3.25 3.2,3.25, height 1.2
U-D-M5DD-Y-3 [mm]
  oval 0.8x1 hole 0.5: 1(-1.3,0.445) 2(-0.65,-0.555) 3(0,0.445) 4(0.65,-0.555) 5(1.3,0.445)
  oval 1x2.5 hole 0.5 slot 1.8 at 90 deg: SH1(-3.575,0.555) SH2(3.575,0.555)
  silkscreen extent -3.5,-1.74 3.56,2.29, body extent -4,-1.76 4,2.24, height 6.58
U.FL-R-SMT(10) [mm]
  rect 1.05x1 smd: 1(-0.763,0)
  rect 2.2x1.05 smd: 2(0.763,1.475) 3(0.763,-1.475)
  silkscreen extent -0.66,-1.3 2.18,1.3, body extent -0.79,-1.5 2.31,1.5, height 1.25
VRB1212S-10WR3 [mm]
  rect 1.8x1.8 hole 1.1: 1(-8.89,0)
  round 1.8 hole 1.1: 2(-6.35,0) 3(-3.81,0) 5(1.27,0) 6(3.81,0) 7(6.35,0) 8(8.89,0)
  silkscreen extent -11,-6.95 11,2.55, body extent -11,-7 11,2.5, height 12.1
WSON-6-EP(2x2) [mm]
  rect 0.45x0.4 smd paste+0 mask+0.051: 1(-0.975,0.65) 2(-0.975,0) 3(-0.975,-0.65) 4(0.975,-0.65) 5(0.975,0) 6(0.975,0.65)
  rect 1x1.6 smd paste+0 mask+0.051: 7(0,0)
  silkscreen extent -1.47,-1.05 1.05,1.05, body extent -1.01,-1 1.01,1, height 0.81
WSON-8-EP(6x8) [mm]
  rect 1.2x0.6 smd: 1(-3.8,1.905) 2(-3.8,0.635) 3(-3.8,-0.635) 4(-3.8,-1.905) 5(3.8,-1.905) 6(3.8,-0.635) 7(3.8,0.635) 8(3.8,1.905)
  rect 3.4x4.3 smd: 9(0,0)
  silkscreen extent -4.72,-3 4,3, body extent -4,-3 4,3, height 0.8
YNR4018-220M [mm]
  rect 1.6x3.5 smd paste+0 mask+0.051: 1(-1.6,0) 2(1.6,0)
  silkscreen extent -2.08,-2.07 2.08,2.07, body extent -2.01,-2 2.01,2, height 1.87
YSPI0518S-4R7M [mm]
  rect 1.9x2.5 smd: 1(-2.05,0) 2(2.05,0)
  silkscreen extent -2.7,-2.6 2.7,2.6